# Altium PCB DC-Motor-Driver-v2.0.PcbDoc (part 1 of 5)
Units mil, origin at the board's own origin, x right, y up, seen from the top; angles counter-clockwise.
Board outline 3074 x 1810 mil, 4 copper layers (Top Layer, Signal 1, Signal 2, Bottom Layer), stack 62.055 mil thick; 232 components, 182 nets, 976 pads, 361 vias.
Unrouted connection lines stored in the file: 36.
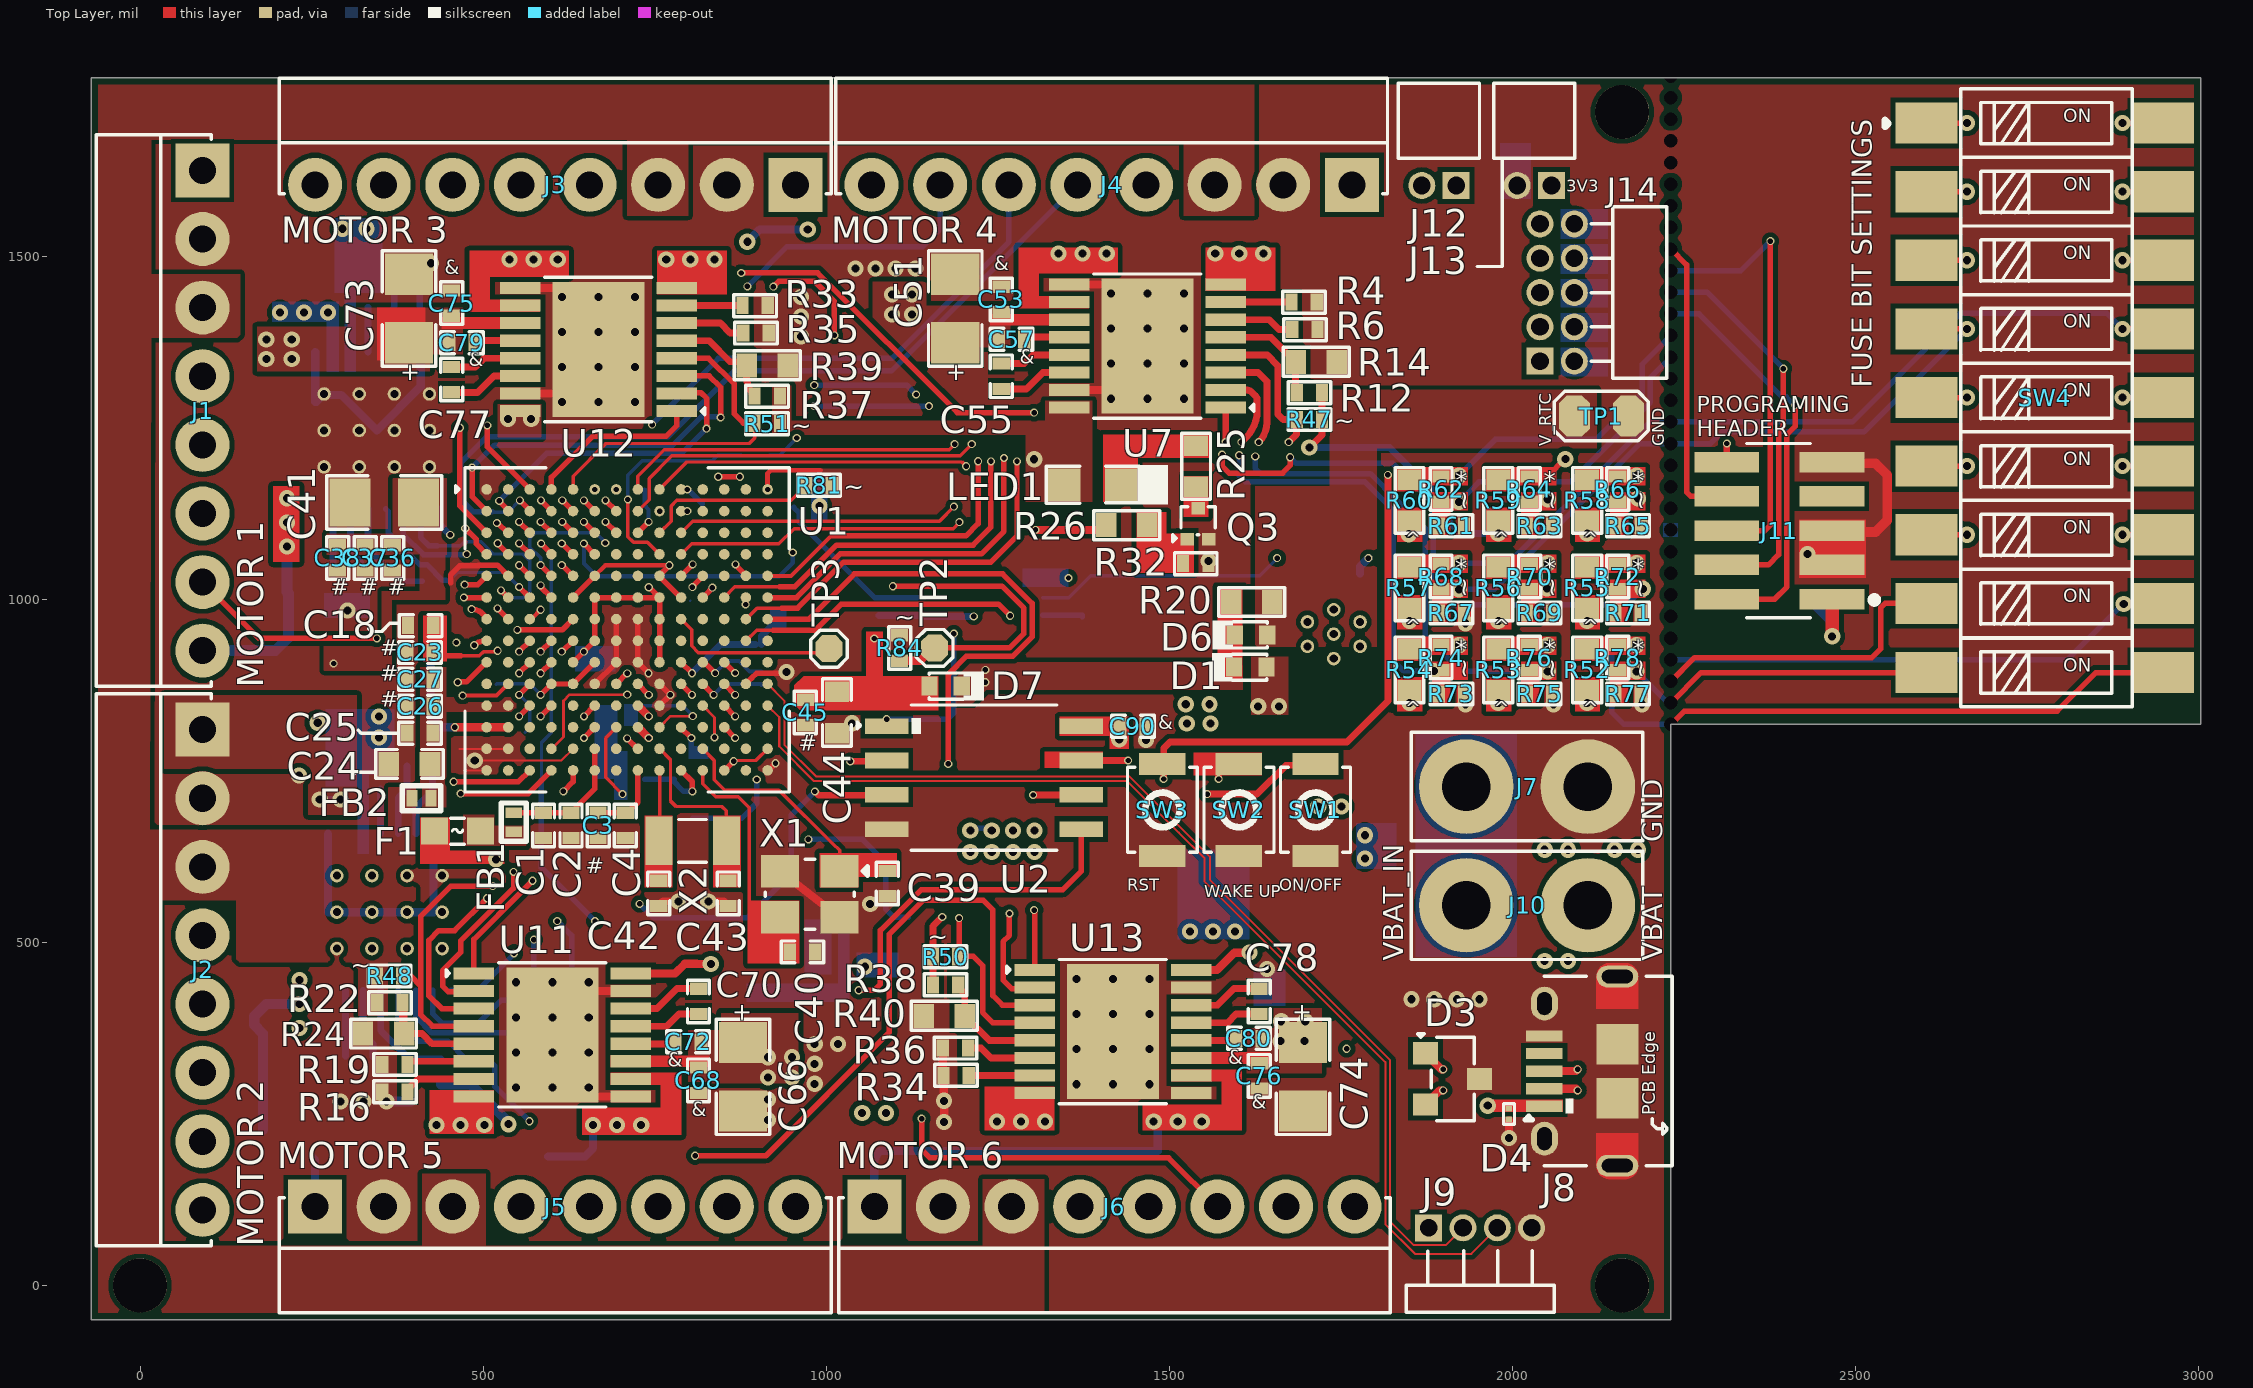
[diagram p0: Top Layer view]
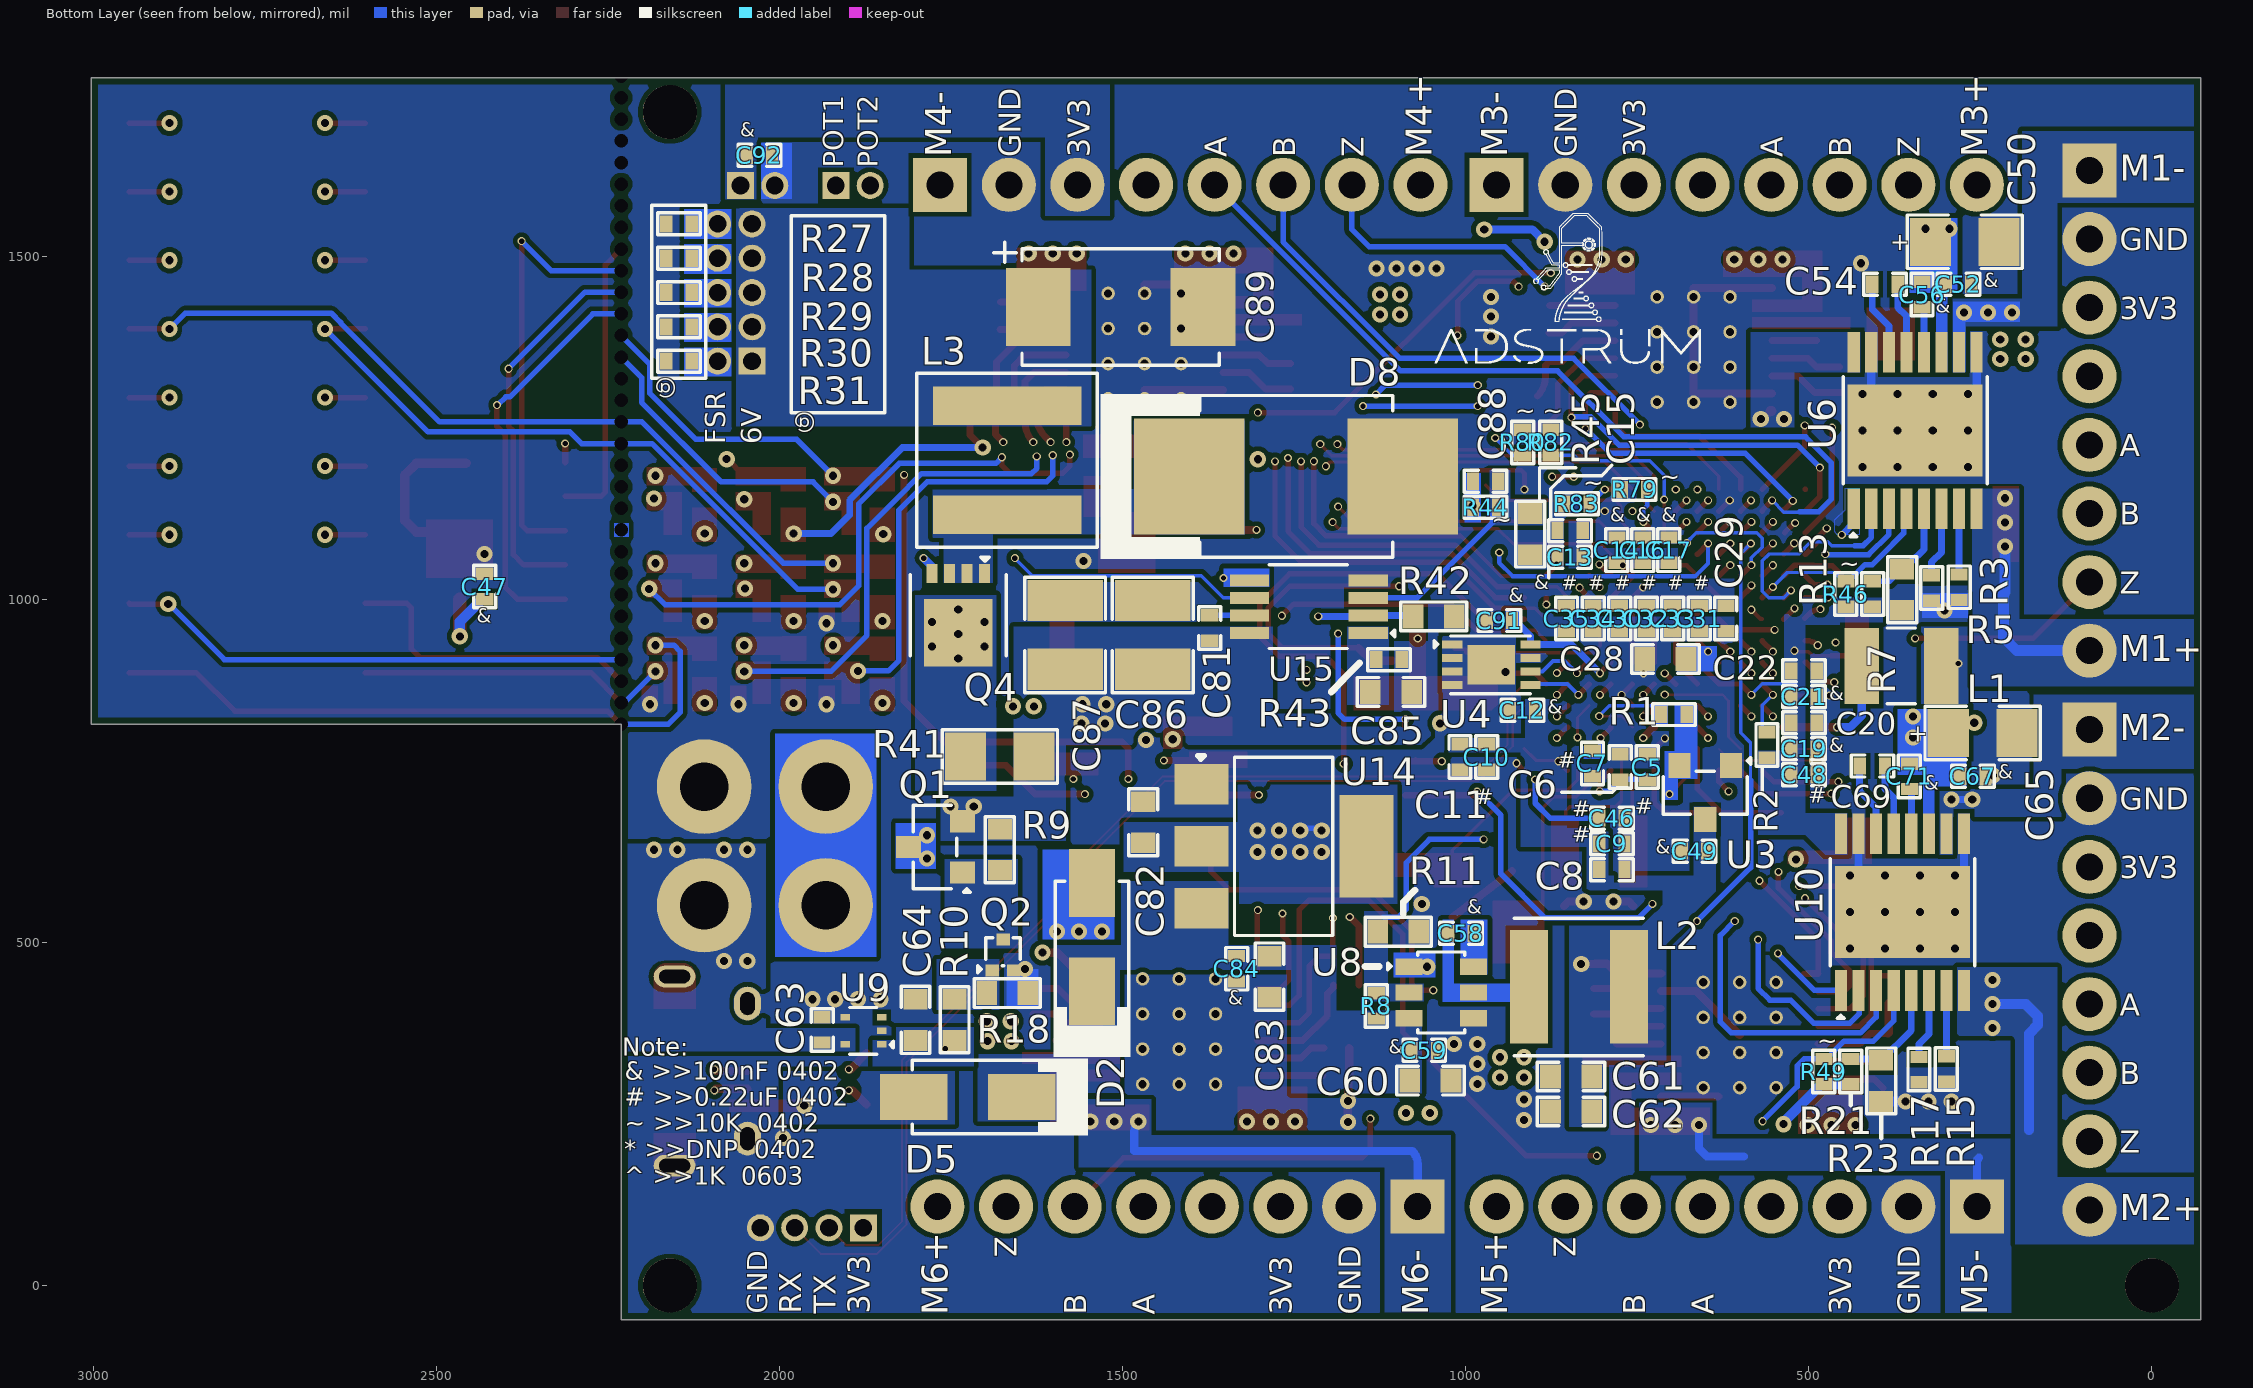
[diagram p1: Bottom Layer view, seen from below]
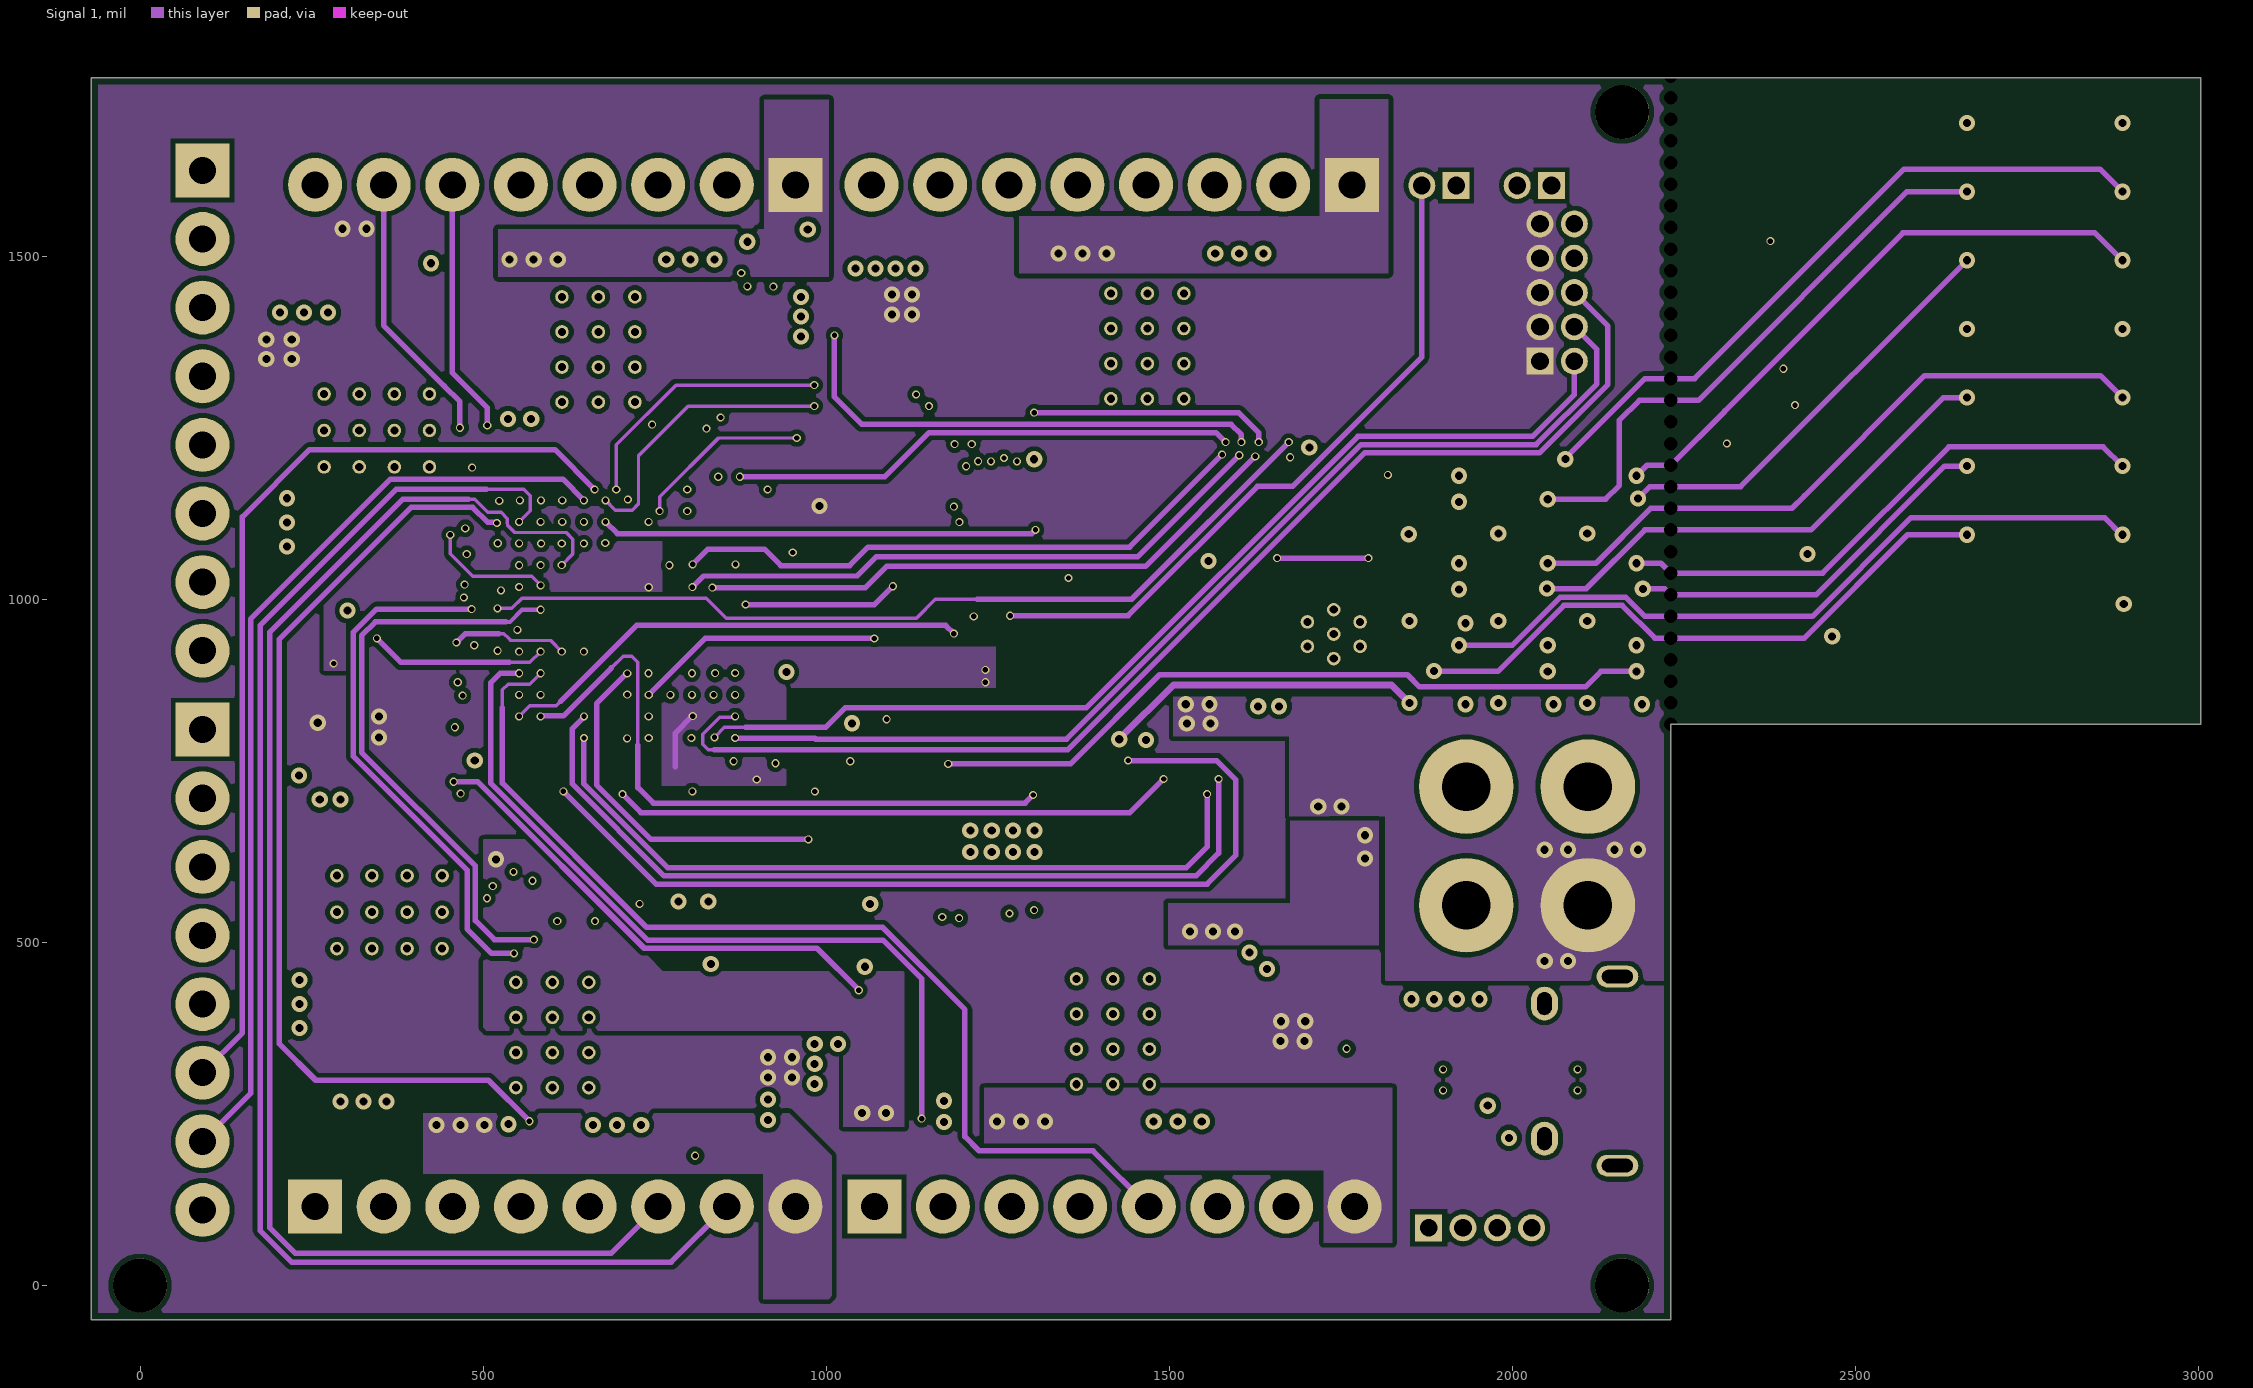
[diagram p2: Signal 1]
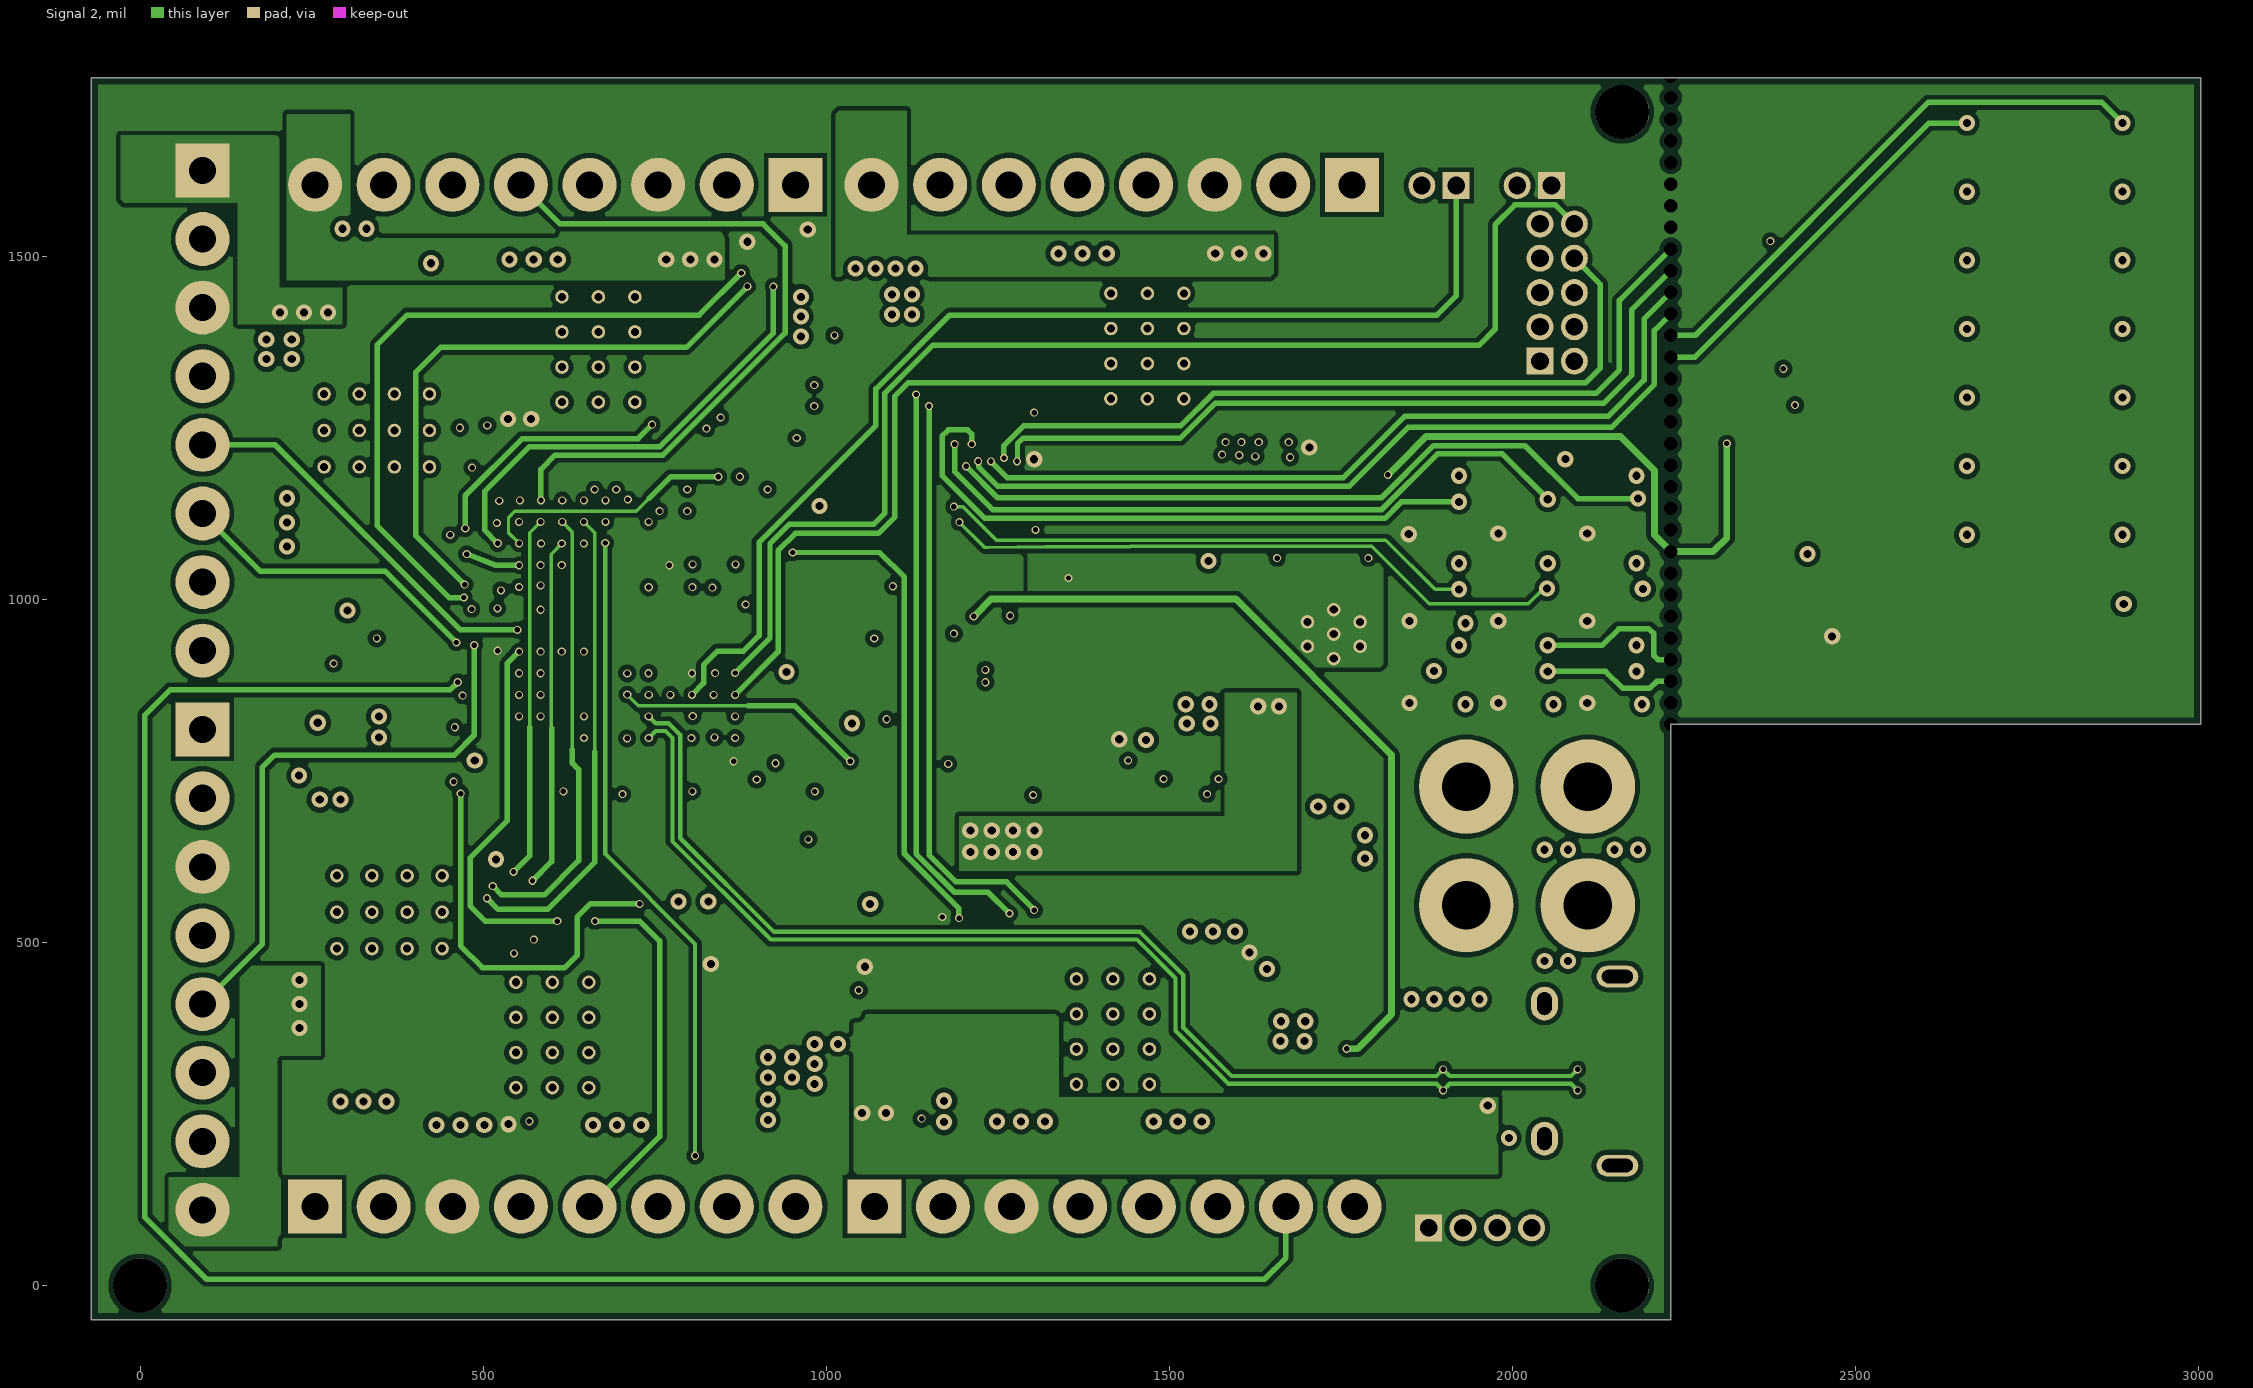
[diagram p3: Signal 2]

## Layer stack, top to bottom
Top Solder: solder mask 0.5, Solder Resist, Dk 3.5
Top Layer: signal copper 1.181
Dielectric 2: prepreg 8.284, PP-006, Dk 4.1
Signal 1: signal copper 0.598
Dielectric 1: core 41.929, FR-4, Dk 4.8
Signal 2: signal copper 0.598
Dielectric 3: prepreg 8.284, PP-006, Dk 4.1
Bottom Layer: signal copper 1.181
Bottom Solder: solder mask 0.5, Solder Resist, Dk 3.5

## Board outline
-71,-50 2231,-50 2231,817.54 3003,817.54 3003,1760 -71,1760

## Design rules (kind name [scope] priority, off if disabled: settings)
BoardOutlineClearance [All] p1: gap=0 ignorepadtopadclearanceinfootprint=FALSE except(10: Poly-OutlineEdge)
Clearance Clearance_1 [All] p1: gap=7 ignorepadtopadclearanceinfootprint=FALSE except(4: Arc-Arc Arc-Track Arc-SMDPad Arc-THPad Track-Track Track-SMDPad Track-THPad SMDPad-SMDPad SMDPad-THPad THPad-THPad)
Clearance Clearance_BGA [WithinRoom('BGA')] p2: gap=3 ignorepadtopadclearanceinfootprint=FALSE
DiffPairsRouting [All] p1: maxlimit=5 minlimit=4 mostfreqgap=5 toplayer_maxgap=4 toplayer_prefgap=4 toplayer_minwidth=12 toplayer_maxwidth=12 toplayer_prefwidth=12 midlayer1_mingap=5 midlayer1_minwidth=6.27 midlayer1_maxwidth=6.27 midlayer1_prefwidth=6.27 midlayer2_mingap=5 midlayer2_minwidth=6.27 midlayer2_maxwidth=6.27 midlayer2_prefwidth=6.27 bottomlayer_maxgap=4 bottomlayer_prefgap=4 bottomlayer_minwidth=12 bottomlayer_maxwidth=12 bottomlayer_prefwidth=12 impedanceprofiledriven=TRUE impedanceprofileid={C171A0CF-75CA-4105-AF21-8C6E3F260B6E} impedanceprofilevalue=90.000000 maxuncoupledlength=500
HoleToHoleClearance [All] p1: gap=0 allowstackedmicrovias=TRUE
MatchedLengths "Schematic Matched Net Lengths" [InNetClass('GSM_USB')] p1: tolerance=50 checknetsindiffpair=TRUE checkdiffpairvsdiffpair=FALSE checkxsignals=FALSE checkothers=FALSE
MaxMinImpedance "Schematic Impedance Constraint" [InNetClass('GSM_USB')] p1: minimum=85.00 maximum=90.00
MinimumSolderMaskSliver [All] p1: minsoldermaskwidth=0
PolygonConnect [All] p1: connectstyle=Direct reliefconductorwidth=10 reliefentries=4 polygonreliefangle="90 Angle" airgapwidth=10
RoutingVias RoutingVias_BGA [WithinRoom('BGA')] p1: holewidth=7.87 width=11.81 viastyle="Through Hole" minholewidth=7.87 minwidth=11.81 maxholewidth=7.87 maxwidth=11.81
RoutingVias [All] p2: holewidth=11.81 width=23.62 viastyle="Through Hole" minholewidth=7.87 minwidth=11.81 maxholewidth=11.81 maxwidth=23.62
SilkToSilkClearance [All] p1: silktosilkclearance=0
SilkToSolderMaskClearance [IsPad] p1: minsilkscreentomaskgap=0 clearancetoexposedcopper=TRUE
SolderMaskExpansion [All] p1: expansion=4 istentingtop=FALSE
UnRoutedNet [All] p1: checkbadconnections=TRUE
Width [All] p1: maxlimit=100 minlimit=3 preferedwidth=22
Width Width_BGA [WithinRoom('BGA')] p2: maxlimit=3 minlimit=3 preferedwidth=3
24 further rules are at their usual default settings.

## Classes and differential pairs
component class Power_Section: C58 C59 C60 C61 C62 C63 C64 C81 C82 C83 C84 C85 C86 C87 C88 C89 D2 D3 D4 D5 D8 J7 J8 J10 L2 L3 Q1 Q2 Q4 R8 R9 R10 R11 R18 R41 R42 R43 R44 R45 U8 U9 U14 U15
component class Motor_Section: C50 C51 C52 C53 C54 C55 C56 C57 C65 C66 C67 C68 C69 C70 C71 C72 C73 C74 C75 C76 C77 C78 C79 C80 C92 J1 J2 J3 J4 J5 J6 J9 J12 J13 J14 LED1 Q3 R3 R4 R5 R6 R7 R12 R13 R14 R15 R16 R17 R19 R21 R22 R23 R24 R25 R26 R27 R28 R29 R30 R31 R32 R33 R34 R35 R36 R37 R38 R39 R40 R46 R47 R48 R49 R50 R51 R84 TP2 TP3 U6 U7 U10 U11 U12 U13
component class Controller_Section: C1 C2 C3 C4 C5 C6 C7 C8 C9 C10 C11 C12 C13 C14 C15 C16 C17 C18 C19 C20 C21 C22 C23 C24 C25 C26 C27 C28 C29 C30 C31 C32 C33 C34 C35 C36 C37 C38 C39 C40 C41 C42 C43 C44 C45 C46 C47 C48 C49 C90 C91 D1 D6 D7 F1 FB1 FB2 J11 L1 R1 R2 R20 SW1 SW2 SW3 TP1 U1 U2 U3 U4 X1 X2
component class Controller_Fuses_Sheet: R52 R53 R54 R55 R56 R57 R58 R59 R60 R61 R62 R63 R64 R65 R66 R67 R68 R69 R70 R71 R72 R73 R74 R75 R76 R77 R78 R79 R80 R81 R82 R83 SW4
differential pair class GSM_USB_Lines: USB_D
net class GSM_USB: USB_D_N USB_D_P
differential pair USB_D: +USB_D_P -USB_D_N

## Components (designator, comment, footprint, x,y, rotation, side; value= is the part's Value field where it differs from the comment)
C1 "1uF" Cap-0402 588,670.5 r90 top locked
C2 "1uF" Cap-0402 628,670.5 r90 top locked
C3 "0.22uF" Cap-0402 667.5,670.5 r90 top locked
C4 "4.7uF" Cap-0402 707,670.5 r90 top locked
C5 "0.22uF" Cap-0402 735.5,755.5 r270 bottom locked
C6 "4.7uF" Cap-0402 775,755.5 r270 bottom locked
C7 "0.22uF" Cap-0402 815.29,760.8 r90 bottom locked
C8 "4.7uF" Cap-0402 787.08,606 r0 bottom locked
C9 "0.22uF" Cap-0402 787.08,643.5 r0 bottom locked
C10 "0.22uF" Cap-0402 969.46,770 r90 bottom locked
C11 "1uF" Cap-0402 1008.46,770 r90 bottom locked
C12 "100nF" Cap-0402 917.5,838 r180 bottom locked
C13 "100nF" Cap-0402 847.77,1061.5 r180 bottom locked
C14 "100nF" Cap-0402 779.77,1071.5 r270 bottom locked
C15 "4.7uF" Cap-0402 847.77,1100 r180 bottom locked
C16 "100nF" Cap-0402 741.89,1071.5 r270 bottom locked
C17 "100nF" Cap-0402 704,1071.5 r270 bottom locked
C18 "4.7uF" Cap-0402 409,961.57 r0 top locked
C19 "100nF" Cap-0402 507,781.89 r0 bottom locked
C20 "4.7uF" Cap-0402 507,819.78 r0 bottom locked
C21 "100nF" Cap-0402 507,857.67 r0 bottom locked
C22 "4.7uF" Cap-0402 507,895.56 r0 bottom locked
C23 "0.22uF" Cap-0402 408.08,922.43 r0 top locked
C24 "22uF" Cap-0603 392.54,760 r0 top locked
C25 "4.7uF" Cap-0402 408.08,805 r180 top locked
C26 "0.22uF" Cap-0402 408.08,844.14 r0 top locked
C27 "0.22uF" Cap-0402 408.08,883.29 r0 top locked
C28 "22uF" Cap-0603 709,913 r180 bottom
C29 "4.7uF" Cap-0402 620.94,971.84 r270 bottom locked
C30 "0.22uF" Cap-0402 775.72,971.84 r90 bottom locked
C31 "0.22uF" Cap-0402 659.63,971.84 r90 bottom locked
C32 "0.22uF" Cap-0402 737.02,971.84 r90 bottom locked
C33 "0.22uF" Cap-0402 698.33,971.84 r90 bottom locked
C34 "0.22uF" Cap-0402 814.41,971.84 r90 bottom locked
C35 "0.22uF" Cap-0402 853.11,971.84 r90 bottom locked
C36 "0.22uF" Cap-0402 368.06,1060.38 r90 top
C37 "0.22uF" Cap-0402 327.99,1060.38 r90 top
C38 "0.22uF" Cap-0402 287.92,1060.38 r90 top
C39 "12pF" Cap-0402 1089,585.5 r270 top locked
C40 "12pF" Cap-0402 965.5,486 r0 top locked
C41 "33uF" Cap-1206 355.92,1141 r0 top
C42 "12pF" Cap-0402 756,571.5 r270 top locked
C43 "12pF" Cap-0402 857,571.5 r270 top locked
C44 "10uF" Cap-0603 1015.54,835 r90 top locked
C45 "0.22uF" Cap-0402 969.54,835 r90 top locked
C46 "0.22uF" Cap-0402 787.08,681 r0 bottom locked
C47 "100nF" Cap-0402 2429.77,1018.5 r270 bottom
C48 "0.22uF" Cap-0402 507,744 r0 bottom locked
C49 "100nF" Cap-0402 666.5,633 r180 bottom locked
C50 "47uF" Tant-1206 272.76,1521 r180 bottom locked
C51 "47uF" Tant-1206 1188,1423.76 r90 top
C52 "100nF" Cap-0402 282,1459 r0 bottom locked
C53 "100nF" Cap-0402 1255,1437 r270 top locked
C54 "22nF" Cap-0402 389,1459 r0 bottom locked
C55 "22nF" Cap-0402 1255,1325 r270 top locked
C56 "100nF" cap-0402 335,1444 r270 bottom locked
C57 "100nF" cap-0402 1270,1379 r0 top locked
C58 "100nF" Cap-0402 1007,513 r180 bottom locked
C59 "100nF" Cap-0402 1060.5,342.5 r0 bottom locked
C60 "10uF" Cap-0603 1051.5,298.5 r0 bottom locked
C61 "22uF" Cap-0603 846.5,304.5 r180 bottom locked
C62 "22uF" Cap-0603 846.5,253.5 r180 bottom locked
C63 "1uF" Cap-0402 1938,372.5 r270 bottom locked
C64 "1nF" CAP-0603 1802,387 r270 bottom locked
C65 "47uF" Tant-1206 246.74,805 r180 bottom
C66 "47uF" Tant-1206 878.9,304 r270 top locked
C67 "100nF" cap-0402 261,742 r0 bottom
C68 "100nF" Cap-0402 813.8,299 r90 top locked
C69 "22nF" Cap-0402 407.5,757 r0 bottom locked
C70 "22nF" Cap-0402 813.8,414 r90 top locked
C71 "100nF" cap-0402 353.5,742 r270 bottom locked
C72 "100nF" cap-0402 798.8,355 r180 top locked
C73 "47uF" Tant-1206 392,1423.76 r90 top locked
C74 "47uF" Tant-1206 1695,304 r270 top locked
C75 "100nF" cap-0402 454,1431.5 r270 top locked
C76 "100nF" cap-0402 1631,305.5 r90 top locked
C77 "22nF" Cap-0402 454,1320 r270 top locked
C78 "22nF" Cap-0402 1630.8,414 r90 top locked
C79 "100nF" cap-0402 469,1374 r0 top locked
C80 "100nF" cap-0402 1615.8,360 r180 top locked
C81 "470nF" Cap-0402 1373,958 r270 bottom locked
C82 "22uF" Cap-0603 1470,675 r270 bottom locked
C83 "10uF" Cap-0603 1286,450 r90 bottom locked
C84 "100nF" Cap-0402 1334,461.5 r90 bottom locked
C85 "1nF" Cap-0603 1109,865 r180 bottom locked
C86 "47uF" Cap-1210 1456,948 r270 bottom locked
C87 "47uF" Cap-1210 1584,948 r270 bottom locked
C88 "3nF" Cap-0402 971,1172 r0 bottom locked
C89 "47uF" Case-D 1503.01,1426 r180 bottom locked
C90 "100nF" Cap-0402 1447,815 r180 top
C91 "100nF" Cap-0402 951.03,968.98 r180 bottom locked
C92 "100nF" Cap-0402 2029.5,1647 r0 bottom locked
D1 "RB521S30YL" SOD-523 1618,901 r180 top
D2 "SS36" SMA 1544.72,507.74 r90 bottom locked
D3 "ESD5302F-3/TR" Sot-23 1912.63,301 r270 top locked
D4 "PESD5V0H1BSFYL" DSN0603-2 1995,249.87 r90 top locked
D5 "SS36" SMA 1725.74,274.5 r0 bottom locked
D6 "RB521S30YL" SOD-523 1619,948 r180 top
D7 "RB521S30YL" SOD-523 1174,873.5 r0 top
D8 "B540C-13-F" SMC 1247.49,1179 r180 bottom locked value=300pF
F1 "SMD0603-050" Fuse-0603 462.54,662 r0 top locked
FB1 "BLM15PD121SN1D" IND-0402 544.5,675.06 r90 top locked
FB2 "BLM15PD121SN1D" IND-0402 410.22,710 r0 top locked
J1 "PZ254R-11-08P" "HDR 1x8 Male Right Angle" 91,1275 r270 top locked
J2 "PZ254R-11-08P" "HDR 1x8 Male Right Angle" 91,460 r270 top locked
J3 "PZ254R-11-08P" "HDR 1x8 Male Right Angle" 605,1604 r180 top locked
J4 "PZ254R-11-08P" "HDR 1x8 Male Right Angle" 1416,1604 r180 top locked
J5 "PZ254R-11-08P" "HDR 1x8 Male Right Angle" 605,115 r0 top locked
J6 "PZ254R-11-08P" "HDR 1x8 Male Right Angle" 1420,115 r0 top locked
J7 "Through Hole Pads 2" "Through Hole Pads 2" 1932.83,727 r0 top locked
J8 "10118194-0001LF" 10118194-0001LF_ 2046.7,312.37 r90 top locked
J9 "KH-1.27PH90-1X4P-L10.5" "HDR1X4 (R/A Male) 1.27mm Pitch" 1953,84 r0 top locked
J10 "Through Hole Pads 2" "Through Hole Pads 2" 1932.83,554 r0 top locked
J11 "20021121-00010C4LF" 20021121-00010C4LF_ 2389.23,1100 r90 top locked
J12 "1.27-2P" "HDR1X2 (R/A Male) 1.27mm Pitch" 1893,1603 r180 top locked
J13 "1.27-2P" "HDR1X2 (R/A Male) 1.27mm Pitch" 2032,1603 r180 top locked
J14 "1271WR-2x5P" "HDR 2x5TH (rigth angle) 1.27mm Pitch" 2065.2,1447 r90 top locked
L1 "4.7uH" IND-1210 365,903 r0 bottom
L2 "3.9uH" SWPA5020S3R9NT 835,435 r180 bottom locked
L3 "1uH" XAL6030-102MEC 1668,1202.53 r90 bottom locked
LED1 "Orange" LED-0805 1388.32,1167 r0 top locked
Q1 "AO3407" SOT-23 1773,639 r90 bottom locked
Q2 "MMBT3904M" SOT-723 1674.25,481.64 r180 bottom locked
Q3 "MMBT3904M" SOT-723 1542,1110 r0 top
Q4 "CSD25402Q3A" "8-VSONP (3x3.3)" 1739.61,975.62 r270 bottom locked
R1 "100K" Res-0402 696.5,832 r180 bottom locked
R2 "30K" Res-0402 561,787.5 r90 bottom locked
R3 "0R" Res-0402 281.02,1017.5 r270 bottom locked
R4 "0R" Res-0402 1696.5,1433 r0 top locked
R5 "4.3k" Res-0402 321,1016.5 r270 bottom locked value=4.3kR
R6 "4.3k" Res-0402 1697.5,1393 r0 top locked value=4.3kR
R7 "1K" Res-0402 407,1007.5 r270 bottom
R8 "DNP" Res-0402 1130.5,407.5 r270 bottom locked
R9 "1K" Res-0603 1679,635 r270 bottom locked
R10 "4.7K" Res-0603 1745,387 r90 bottom locked
R11 "1M" Res-0603 1098.5,515.5 r0 bottom locked
R12 "1K" Res-0402 1704,1301 r0 top
R13 "3.16K" Res-0603 364,1014 r90 bottom
R14 "3.16K" Res-0603 1714,1346 r180 top locked
R15 "0R" Res-0402 299.52,315.5 r270 bottom locked
R16 "0R" Res-0402 371.3,282.02 r180 top
R17 "4.3k" Res-0402 339.5,314.5 r270 bottom locked value=4.3kR
R18 "1M" Res-0603 1668,426 r0 bottom
R19 "4.3k" Res-0402 371.3,322 r180 top value=4.3kR
R20 "1K" Res-0603 1620,996 r180 top
R21 "1K" Res-0402 439,311.5 r270 bottom locked
R22 "1K" Res-0402 364,412 r180 top
R23 "3.16K" Res-0603 394.5,298 r90 bottom locked
R24 "3.16K" Res-0603 354.8,367 r0 top
R25 "130R" Res-0603 1539,1193.83 r90 top
R26 "4.7K" Res-0603 1438,1108 r0 top locked
R27 "2.87k" Res-0402 2146.5,1547 r180 bottom locked
R28 "2.87k" Res-0402 2146.5,1497 r180 bottom locked
R29 "2.87k" Res-0402 2146.5,1447 r180 bottom locked
R30 "2.87k" Res-0402 2146.5,1397 r180 bottom locked
R31 "2.87k" Res-0402 2146.5,1347 r180 bottom locked
R32 "47K" Res-0402 1538.5,1052 r0 top
R33 "0R" Res-0402 896.5,1427.98 r0 top locked
R34 "0R" Res-0402 1189.3,306.02 r180 top locked
R35 "4.3k" Res-0402 897.5,1388 r0 top locked value=4.3kR
R36 "4.3k" Res-0402 1188.3,346 r180 top locked value=4.3kR
R37 "1K" Res-0402 914,1296 r0 top
R38 "1K" Res-0402 1174,438 r180 top
R39 "3.16K" Res-0603 914,1341 r180 top locked
R40 "3.16K" Res-0603 1171.8,393 r0 top locked
R41 "10mR" Res-1206 1679,771 r180 bottom locked
R42 "68.1K" Res-0603 1046.54,975 r180 bottom locked
R43 "4.12K" Res-0402 1112,912 r180 bottom locked value=4.12kR
R44 "10K" Res-0402 971,1134 r180 bottom locked
R45 "2.61k" Res-0603 906,1095 r90 bottom locked value=2.61kR
R46 "10K" Res-0402 446,1007.5 r90 bottom
R47 "10K" Res-0402 1704,1262 r180 top locked
R48 "10K" Res-0402 363.5,451 r0 top
R49 "10K" Res-0402 478,311.5 r90 bottom locked
R50 "10K" Res-0402 1174,479 r0 top locked
R51 "10K" Res-0402 914,1256 r180 top locked
R52 "1K" Res-0603 2109,897 r270 top
R53 "1K" Res-0603 1979.5,897 r270 top
R54 "1K" Res-0603 1850,897 r270 top
R55 "1K" Res-0603 2109,1016.5 r270 top
R56 "1K" Res-0603 1979.5,1016.5 r270 top
R57 "1K" Res-0603 1850,1016.5 r270 top
R58 "1K" Res-0603 2109,1144 r270 top
R59 "1K" Res-0603 1979.5,1144 r270 top
R60 "1K" Res-0603 1850,1144 r270 top
R61 "10K" Res-0402 1911,1107 r180 top
R62 "DNP" Res-0402 1896,1160.5 r90 top
R63 "10K" Res-0402 2039.5,1107 r180 top
R64 "DNP" Res-0402 2024.5,1160.5 r90 top
R65 "10K" Res-0402 2168.5,1107 r180 top
R66 "DNP" Res-0402 2153.5,1160.5 r90 top
R67 "10K" Res-0402 1911,980 r180 top
R68 "DNP" Res-0402 1896,1033 r90 top
R69 "10K" Res-0402 2039.5,980 r180 top
R70 "DNP" Res-0402 2025,1033 r90 top
R71 "10K" Res-0402 2168.5,980 r180 top
R72 "DNP" Res-0402 2153.5,1033 r90 top
R73 "10K" Res-0402 1911,862 r180 top
R74 "DNP" Res-0402 1896,915 r90 top
R75 "10K" Res-0402 2039.5,862 r180 top
R76 "DNP" Res-0402 2024.5,915 r90 top
R77 "10K" Res-0402 2168.5,862 r180 top
R78 "DNP" Res-0402 2153.5,915 r90 top
R79 "10K" Res-0402 754,1160 r180 bottom
R80 "10K" Res-0402 917,1228.5 r270 bottom
R81 "10K" Res-0402 989.5,1166 r180 top
R82 "10K" Res-0402 876,1228.5 r270 bottom
R83 "10K" Res-0402 838,1139 r180 bottom
R84 "10K" Res-0402 1107,929 r90 top
SW1 "B3U-1000P" B3U-1000P 1713,693 r270 top locked
SW2 "B3U-1000P" B3U-1000P 1601.5,693 r270 top locked
SW3 "B3U-1000P" B3U-1000P 1490,693 r270 top locked
SW4 "DSIC09LSGET" DSIC09LSGET 2775.75,1293.6 r270 top locked
TP1 "2 Test Pad" "2 Test Pad" 2090.26,1267 r0 top
TP2 "TEST POINT 0.5mm Dia" "Test-point - 0.5mm" 1158,929 r90 top
TP3 "TEST POINT 0.5mm Dia" "Test-point - 0.5mm" 1004,928 r90 top
U1 "MIMXRT1062DVJ6B" "196-LFBGA (12x12)" 709.73,955.31 r0 top locked
U2 "W25Q64JVSSIM" "SOIC-8 (208 mil)" 1229.93,740 r0 top locked
U3 "UM803RS" SOT-23 650.91,718.43 r0 bottom locked
U4 "M24C64-FMC6TG" DFN-8-EP(2x3) 962.77,904.5 r180 bottom locked
U6 "DRV8874PWPR" HTSSOP-16 345,1246 r90 bottom locked
U7 "DRV8874PWPR" HTSSOP-16 1468,1369 r180 top locked
U8 "AP63203WU-7" TSOT-23-6 1035.74,426.9 r180 bottom locked
U9 "BD4860FVE-TR" "VSOF 5" 1878,371 r0 bottom locked
U10 "DRV8874PWPR" HTSSOP-16 363.5,544 r90 bottom locked
U11 "DRV8874PWPR" HTSSOP-16 600.8,365 r0 top locked
U12 "DRV8874PWPR" HTSSOP-16 668,1364 r180 top locked
U13 "DRV8874PWPR" HTSSOP-16 1417.8,370 r0 top locked
U14 "AZ1117CH-3.3TRG1" "SOT- 223" 1265,640 r270 bottom locked
U15 "LM25085MM/NOPB" "8-VSSOP (5x3.1mm)" 1228.61,989.2 r0 bottom locked
X1 "24MHZ" X322524MOB4SI- 976.08,570 r180 top locked
X2 "32.7680KHZ" NX3215SA-32.768K-STD-MUA-8_ 805.21,648 r180 top locked

## Footprints (in the part's own frame and the unit in brackets; to place one, negate y for a bottom-side part, rotate by r counter-clockwise, add the part's x,y. Pads: shape width x height; smd on the part's side, far side on the other; paste and mask are expansions set on the pad)
"2 Test Pad" [mil]
  oct 45x60 smd: 1(0,0) 2(78.74,0)
  silkscreen extent -29,-36 108,36
"8-VSONP (3x3.3)" [mm]
  rect 0.7x0.4 smd mask+0.05: 1(-1.576,0.975) 2(-1.576,0.325) 3(-1.576,-0.325) 4(-1.576,-0.975)
  round 0.5 hole 0.3 mask+0: 5(0.219,-0.975) 5(0.219,0.975) 5(1.124,-0.975) 5(1.124,0.975) 6(-0.234,0) 7(0.671,0) 8(1.576,0)
  rect 2.51x2.55 smd mask+0.05: 5(0.619,0)
  silkscreen extent -2.18,-1.78 1.48,1.78, body extent -1.63,-1.73 1.67,1.73, height 0.9
"8-VSSOP (5x3.1mm)" [mm]
  rect 1.45x0.45 smd mask+0.05: 1(-2.2,0.975) 2(-2.2,0.325) 3(-2.2,-0.325) 4(-2.2,-0.975) 5(2.2,-0.975) 6(2.2,-0.325) 7(2.2,0.325) 8(2.2,0.975)
  silkscreen extent -3.17,-1.55 1.47,1.55, body extent -2.45,-1.5 2.45,1.5, height 1.1
"196-LFBGA (12x12)" [mm]
  round 0.39 smd: A1(-5.2,5.2) A2(-4.4,5.2) A3(-3.6,5.2) A4(-2.8,5.2) A5(-2,5.2) A6(-1.2,5.2) A7(-0.4,5.2) A8(0.4,5.2) A9(1.2,5.2) A10(2,5.2) A11(2.8,5.2) A12(3.6,5.2) A13(4.4,5.2) A14(5.2,5.2) B1(-5.2,4.4) B2(-4.4,4.4) B3(-3.6,4.4) B4(-2.8,4.4) B5(-2,4.4) B6(-1.2,4.4) B7(-0.4,4.4) B8(0.4,4.4) B9(1.2,4.4) B10(2,4.4) B11(2.8,4.4) B12(3.6,4.4) B13(4.4,4.4) B14(5.2,4.4) C1(-5.2,3.6) C2(-4.4,3.6) C3(-3.6,3.6) C4(-2.8,3.6) C5(-2,3.6) C6(-1.2,3.6) C7(-0.4,3.6) C8(0.4,3.6) C9(1.2,3.6) C10(2,3.6) C11(2.8,3.6) C12(3.6,3.6) C13(4.4,3.6) C14(5.2,3.6) D1(-5.2,2.8) D2(-4.4,2.8) D3(-3.6,2.8) D4(-2.8,2.8) D5(-2,2.8) D6(-1.2,2.8) D7(-0.4,2.8) D8(0.4,2.8) D9(1.2,2.8) D10(2,2.8) D11(2.8,2.8) D12(3.6,2.8) D13(4.4,2.8) D14(5.2,2.8) E1(-5.2,2) E2(-4.4,2) E3(-3.6,2) E4(-2.8,2) E5(-2,2) E6(-1.2,2) E7(-0.4,2) E8(0.4,2) E9(1.2,2) E10(2,2) E11(2.8,2) E12(3.6,2) E13(4.4,2) E14(5.2,2) F1(-5.2,1.2) F2(-4.4,1.2) F3(-3.6,1.2) F4(-2.8,1.2) F5(-2,1.2) F6(-1.2,1.2) F7(-0.4,1.2) F8(0.4,1.2) F9(1.2,1.2) F10(2,1.2) F11(2.8,1.2) F12(3.6,1.2) F13(4.4,1.2) F14(5.2,1.2) G1(-5.2,0.4) G2(-4.4,0.4) G3(-3.6,0.4) G4(-2.8,0.4) G5(-2,0.4) G6(-1.2,0.4) G7(-0.4,0.4) G8(0.4,0.4) G9(1.2,0.4) G10(2,0.4) G11(2.8,0.4) G12(3.6,0.4) G13(4.4,0.4) G14(5.2,0.4) H1(-5.2,-0.4) H2(-4.4,-0.4) H3(-3.6,-0.4) H4(-2.8,-0.4) H5(-2,-0.4) H6(-1.2,-0.4) H7(-0.4,-0.4) H8(0.4,-0.4) H9(1.2,-0.4) H10(2,-0.4) H11(2.8,-0.4) H12(3.6,-0.4) H13(4.4,-0.4) H14(5.2,-0.4) J1(-5.2,-1.2) J2(-4.4,-1.2) J3(-3.6,-1.2) J4(-2.8,-1.2) J5(-2,-1.2) J6(-1.2,-1.2) J7(-0.4,-1.2) J8(0.4,-1.2) J9(1.2,-1.2) J10(2,-1.2) J11(2.8,-1.2) J12(3.6,-1.2) J13(4.4,-1.2) J14(5.2,-1.2) K1(-5.2,-2) K2(-4.4,-2) K3(-3.6,-2) K4(-2.8,-2) K5(-2,-2) K6(-1.2,-2) K7(-0.4,-2) K8(0.4,-2) K9(1.2,-2) K10(2,-2) K11(2.8,-2) K12(3.6,-2) K13(4.4,-2) K14(5.2,-2) L1(-5.2,-2.8) L2(-4.4,-2.8) L3(-3.6,-2.8) L4(-2.8,-2.8) L5(-2,-2.8) L6(-1.2,-2.8) L7(-0.4,-2.8) L8(0.4,-2.8) L9(1.2,-2.8) L10(2,-2.8) L11(2.8,-2.8) L12(3.6,-2.8) L13(4.4,-2.8) L14(5.2,-2.8) M1(-5.2,-3.6) M2(-4.4,-3.6) M3(-3.6,-3.6) M4(-2.8,-3.6) M5(-2,-3.6) M6(-1.2,-3.6) M7(-0.4,-3.6) M8(0.4,-3.6) M9(1.2,-3.6) M10(2,-3.6) M11(2.8,-3.6) M12(3.6,-3.6) M13(4.4,-3.6) M14(5.2,-3.6) N1(-5.2,-4.4) N2(-4.4,-4.4) N3(-3.6,-4.4) N4(-2.8,-4.4) N5(-2,-4.4) N6(-1.2,-4.4) N7(-0.4,-4.4) N8(0.4,-4.4) N9(1.2,-4.4) N10(2,-4.4) N11(2.8,-4.4) N12(3.6,-4.4) N13(4.4,-4.4) N14(5.2,-4.4) P1(-5.2,-5.2) P2(-4.4,-5.2) P3(-3.6,-5.2) P4(-2.8,-5.2) P5(-2,-5.2) P6(-1.2,-5.2) P7(-0.4,-5.2) P8(0.4,-5.2) P9(1.2,-5.2) P10(2,-5.2) P11(2.8,-5.2) P12(3.6,-5.2) P13(4.4,-5.2) P14(5.2,-5.2)
  silkscreen extent -6.35,-6 6,6, body extent -6,-6 6,6, height 1.58
10118194-0001LF_ [mm]
  rect 0.42x1.35 smd: 1(-1.3,0) 2(-0.65,0) 3(0,0) 4(0.65,0) 5(1.3,0)
  rect 1.5x1.55 smd: MP1(-1,-2.7) MP2(1,-2.7)
  oval 1.25x1 hole 0.55 slot 0.85 at 0 deg: S1(-2.5,0) S2(2.5,0)
  oval 0.8x1.55 hole 0.5 slot 1.15 at 90 deg: S3(3.5,-2.7) S4(-3.5,-2.7)
  Top Layer region: 193 vertices and 0 holes, not listed, extent 2.3,-3.48 4,-1.925
  Top Layer region: 193 vertices and 0 holes, not listed, extent -4,-3.475 -2.3,-1.92
  silkscreen extent -3.51,-4.72 3.51,0.71, body extent -4.02,-5.34 4.03,0.19, height 2.69
20021121-00010C4LF_ [mm]
  rect 0.76x2.4 smd: 1(-2.54,-1.95) 2(-2.54,1.95) 3(-1.27,-1.95) 4(-1.27,1.95) 5(0,-1.95) 6(0,1.95) 7(1.27,-1.95) 8(1.27,1.95) 9(2.54,-1.95) 10(2.54,1.95)
  silkscreen extent -3.23,-3.64 3.23,1.22, body extent -3.17,-2.78 3.18,2.72, height 4.5
B3U-1000P [mm] "SWITCH TACTILE SPST-NO 0.05A 12V"
  rect 0.82x1.72 smd: 1(-1.7,0) 2(1.7,0)
  silkscreen extent -1.57,-1.3 1.57,1.3, body extent -2,-1.26 2,1.24, height 1.6
Cap-0402 [mil]
  rect 18x25 smd mask+2.36: 1(-18.5,0) 2(18.5,0)
  silkscreen extent -31,-16 31,16, body extent -20,-10 20,10, height 19
cap-0402 [mil]
  rect 18x25 smd mask+2.36: 1(-18.5,0) 2(18.5,0)
  silkscreen extent -31,-16 31,16, body extent -20,-10 20,10, height 19
Cap-0603 [mil]
  rect 30x35 smd mask+2.36: 1(-30,0) 2(30,0)
  silkscreen extent -49,-21 49,21, body extent -32,-16 31,16, height 34
CAP-0603 [mil]
  rect 30x35 smd mask+2.36: 1(-30,0) 2(30,0)
  silkscreen extent -49,-21 49,21, body extent -32,-16 31,16, height 34
Cap-1206 [mil] "SMD 1206"
  rect 60x70 smd: 1(-50,0) 2(50,0)
  silkscreen extent -84,-39 84,39, body extent -63,-31 63,32, height 39
Cap-1210 [mil] "SMD 1210"
  rect 60x110 smd: 1(-50,0) 2(50,0)
  silkscreen extent -84,-59 84,59, body extent -63,-49 63,49, height 39
Case-D [mm]
  rect 2.4x2.9 smd: 1(-3.05,0) 2(3.05,0)
  silkscreen extent -4.7,-2.15 3.65,2.39, body extent -3.65,-2.16 3.65,2.14, height 4
DFN-8-EP(2x3) [mm]
  rect 0.75x0.3 smd: 1(-1.45,0.75) 2(-1.45,0.25) 3(-1.45,-0.25) 4(-1.45,-0.75) 5(1.45,-0.75) 6(1.45,-0.25) 7(1.45,0.25) 8(1.45,0.75)
  rect 1.75x1.45 smd: 9(0,0)
  silkscreen extent -2.11,-1.07 1.45,1.07, body extent -1.5,-1 1.5,1, height 1
DSIC09LSGET [mil]
  rect 60x90 smd: 1(-400.4,-172.25) 2(-300.4,-172.25) 3(-200.4,-172.25) 4(-100.4,-172.25) 5(-0.4,-172.25) 6(99.6,-172.25) 7(199.6,-172.25) 8(299.6,-172.25) 9(400.4,-172.25) 10(400.4,172.25) 11(299.6,172.25) 12(199.6,172.25) 13(99.6,172.25) 14(-0.4,172.25) 15(-100.4,172.25) 16(-200.4,172.25) 17(-300.4,172.25) 18(-400.4,172.25)
  silkscreen extent -450,-233 450,128, body extent -450,-182 450,184, height 163
DSN0603-2 [mm]
  rect 0.2x0.24 smd mask+0.055: 1(-0.2,0) 2(0.2,0)
  silkscreen extent -0.38,-0.2 0.38,0.2, body extent -0.3,-0.15 0.3,0.15, height 0.32
Fuse-0603 [mm]
  rect 1x1 smd: 1(-0.85,0) 2(0.85,0)
  silkscreen extent -0.25,-0.48 0.25,0.48, body extent -0.77,-0.42 0.78,0.43, height 0.45
"HDR1X2 (R/A Male) 1.27mm Pitch" [mm]
  rect 1x1 hole 0.65 paste+0 mask+0.05: 1(-0.635,0)
  round 1 hole 0.65 paste+0 mask+0.05: 2(0.635,0)
  silkscreen extent -1.5,-3.78 1.5,-1.02, body extent -1.28,-7.3 1.27,0.22, height 2.4
"HDR1X4 (R/A Male) 1.27mm Pitch" [mm] "Connector; Header; 4 Position"
  rect 1x1 hole 0.65 paste+0 mask+0.05: 1(-1.905,0)
  round 1 hole 0.65 paste+0 mask+0.05: 2(-0.635,0) 3(0.635,0) 4(1.905,0)
  silkscreen extent -2.74,-3.13 2.74,-0.86, body extent -2.55,-7.18 2.54,0.23, height 2
"HDR 1x8 Male Right Angle" [mm]
  rect 2x2 hole 1: 1(-8.89,0)
  round 2 hole 1: 2(-6.35,0) 3(-3.81,0) 4(-1.27,0) 5(1.27,0) 6(3.81,0) 7(6.35,0) 8(8.89,0)
  silkscreen extent -10.21,-3.94 10.21,0.33, body extent -10.16,-10.05 10.17,0.35, height 2.5
"HDR 2x5TH (rigth angle) 1.27mm Pitch" [mm]
  rect 1x1 hole 0.65 paste+0 mask+0.05: 1(-2.54,0.635)
  round 1 hole 0.65 paste+0 mask+0.05: 2(-2.54,-0.635) 3(-1.27,0.635) 4(-1.27,-0.635) 5(0,0.635) 6(0,-0.635) 7(1.27,0.635) 8(1.27,-0.635) 9(2.54,0.635) 10(2.54,-0.635)
  silkscreen extent -3.17,-4.07 3.18,-1.27
HTSSOP-16 [mm]
  rect 1.5x0.45 smd: 1(-2.9,2.275) 2(-2.9,1.625) 3(-2.9,0.975) 4(-2.9,0.325) 5(-2.9,-0.325) 6(-2.9,-0.975) 7(-2.9,-1.625) 8(-2.9,-2.275) 9(2.9,-2.275) 10(2.9,-1.625) 11(2.9,-0.975) 12(2.9,-0.325) 13(2.9,0.325) 14(2.9,0.975) 15(2.9,1.625) 16(2.9,2.275)
  round 0.5 hole 0.3: 17(-1.35,-1.95) 17(-1.35,-0.65) 17(-1.35,0.65) 17(-1.35,1.95) 17(0,-1.95) 17(0,-0.65) 17(0,0.65) 17(0,1.95) 17(1.35,-1.95) 17(1.35,-0.65) 17(1.35,0.65) 17(1.35,1.95)
  rect 3.4x5 smd: 17(0,0)
  silkscreen extent -3.94,-2.67 1.98,2.67, body extent -3.2,-2.5 3.2,2.5, height 1.2
IND-0402 [mm]
  rect 0.4x0.6 smd: 1(-0.35,0) 2(0.35,0)
  silkscreen extent -0.71,-0.46 0.71,0.46, body extent -0.5,-0.25 0.5,0.25, height 0.25
IND-1210 [mm]
  rect 1.27x2.81 smd: 1(-1.471,0) 2(1.471,0)
  silkscreen extent -0.52,-1.4 0.52,1.4, body extent -1.6,-1.4 1.6,1.4, height 2.5
LED-0805 [mm]
  rect 1.2x1.2 smd: 1(-1.05,0) 2(1.05,0)
  silkscreen extent -1.73,-0.74 2.79,0.74, body extent -1,-0.62 1,0.63, height 1.1
NX3215SA-32.768K-STD-MUA-8_ [mm]
  rect 1x1.8 smd: 1(-1.25,0) 2(1.25,0)
  silkscreen extent -0.51,-0.79 0.51,0.79, body extent -1.6,-0.75 1.6,0.75, height 0.8
Res-0402 [mil]
  rect 18x25 smd mask+2.17: 1(-18.5,0) 2(18.5,0)
  silkscreen extent -32,-17 32,16, body extent -23,-11 23,11, height 16
Res-0603 [mil]
  rect 30x35 smd: 1(-30,0) 2(30,0)
  silkscreen extent -48,-21 48,21, body extent -31,-17 31,17, height 18
Res-1206 [mil]
  rect 60x70 smd: 1(-50,0) 2(50,0)
  silkscreen extent -84,-39 84,39, body extent -63,-31 63,31, height 24
SMA [mm]
  rect 2.5x1.7 smd: 1(-2,0) 2(2,0)
  silkscreen extent -4.45,-1.42 2.06,1.42, body extent -2.6,-1.3 2.6,1.3, height 2.4
SMC [mm]
  rect 4.1x4.3 smd: 1(-3.95,0) 2(3.95,0)
  silkscreen extent -7.24,-3.05 3.58,3.05, body extent -3.9,-2.95 3.9,2.95, height 2.41
SOD-523 [mm] "SOD-523 Schottky Barrier Diodes (SBD) ROHS"
  rect 0.6x0.7 smd: 1(-0.6,0) 2(0.6,0)
  silkscreen extent -0.61,-0.53 1.42,0.53, body extent -0.8,-0.4 0.8,0.4, height 0.7
"SOIC-8 (208 mil)" [mm]
  rect 1.61x0.58 smd: 1(-3.605,1.905) 2(-3.605,0.635) 3(-3.605,-0.635) 4(-3.605,-1.905) 5(3.605,-1.905) 6(3.605,-0.635) 7(3.605,0.635) 8(3.605,1.905)
  silkscreen extent -4.7,-2.69 2.69,2.69, body extent -3.95,-2.64 3.95,2.64, height 2.16
Sot-23 [mm] "TRANS NPN 40V 0.6A SOT23"
  rect 0.82x0.92 smd: 1(-0.95,-1) 2(0.95,-1) 3(0,1)
  silkscreen extent -1.68,-1.3 1.55,0.81, body extent -1.5,-1.25 1.5,1.25, height 1.05
SOT-23 [mm] "TRANS NPN 40V 0.6A SOT23"
  rect 0.82x0.92 smd: 1(-0.95,-1) 2(0.95,-1) 3(0,1)
  silkscreen extent -1.68,-1.3 1.55,0.81, body extent -1.5,-1.25 1.5,1.25, height 1.05
SOT-723 [mm]
  rect 0.5x0.45 smd: 1(-0.4,-0.575) 2(0.4,-0.575) 3(0,0.575)
  silkscreen extent -0.94,-0.66 0.64,0.64, body extent -0.6,-0.6 0.6,0.6, height 0.5
"SOT- 223" [mm]
  rect 1.5x2 smd: 1(-2.3,-3.05) 2(0,-3.05) 3(2.3,-3.05)
  rect 3.8x2 smd: 4(0,3.05)
  silkscreen extent -3.35,-3.2 3.3,1.8, body extent -3.25,-3.5 3.25,3.5, height 1.61
SWPA5020S3R9NT [mm]
  rect 1.4x4.2 smd: 1(-1.85,0) 2(1.85,0)
  silkscreen extent -2.4,-2.55 2.38,2.55, body extent -2.51,-2.5 2.51,2.5, height 2.12
Tant-1206 [mil]
  rect 60x70 smd: 1(-50,0) 2(50,0)
  silkscreen extent -84,-39 84,39, body extent -63,-31 63,31, height 71
"Test-point - 0.5mm" [mm]
  oct 1x1 smd: 1(0,0)
  silkscreen extent -0.68,-0.68 0.68,0.68
"Through Hole Pads 2" [mm]
  round 3.5 hole 1.8: 1(0,0) 2(4.5,0)
  silkscreen extent -2.03,-2.01 6.53,2.01
TSOT-23-6 [mm]
  rect 1x0.6 smd: 1(-1.2,0.95) 2(-1.2,0) 3(-1.2,-0.95) 4(1.2,-0.95) 5(1.2,0) 6(1.2,0.95)
  silkscreen extent -1.98,-1.5 0.86,1.5, body extent -1.41,-1.45 1.41,1.45, height 1
"VSOF 5" [mm]
  rect 0.35x0.25 smd: 1(-0.675,0.5) 2(-0.675,0) 3(-0.675,-0.5) 4(0.675,-0.5) 5(0.675,0.5)
  silkscreen extent -1.12,-0.86 0.51,0.86, body extent -0.8,-0.82 0.8,0.82, height 0.6
X322524MOB4SI- [mm]
  rect 1.4x1.2 smd: 1(-1.1,-0.85) 2(1.1,-0.85) 3(1.1,0.85) 4(-1.1,0.85)
  silkscreen extent -2.13,-1.3 1.65,1.3, body extent -1.6,-1.25 1.6,1.25, height 0.8
XAL6030-102MEC [mm]
  rect 1.43x5.5 smd: 1(-2.02,0) 2(2.02,0)
  silkscreen extent -3.23,-3.33 3.23,3.35, body extent -3.18,-3.28 3.18,3.29, height 6.1

## Part data
C1 C2 C11 C63: library part CC0402KRX5R7BB105, "CAP CER 1UF 16V X5R 0402", Case Code (Imperial)=0402, Case Code (Metric)=1005, Dielectric=X5R, LCSC Part Number=C325464, Manufacturer=Yageo, Max Operating Temperature=85°C, Min Operating Temperature=-55°C, Supplier Part Number 1=311-1691-6-ND, Tolerance=10%, Voltage Rating=16V, Capacitance=1uF, Case/Package=0402, ComponentLink1Description=http://www.yageo.com/documents/recent/UPY-GPHC_X5R_4V-to-50V_12.pdf?src-supplier=Avnet+Europe, ComponentLink1URL=http://www.yageo.com/documents/recent/UPY-GPHC_X5R_4V-to-50V_12.pdf?src-supplier=Avnet+Europe, Composition=Ceramic, Depth=0.5mm, Halogen Free="Halogen Free", Height=0.5mm, Item Type=Capacitor, Lead Free="Lead Free", Length=1mm, Manufacturer Part Number=CC0402KRX5R7BB105, Mount="Surface Mount", Packaging="Tape and Reel", Pricing 1="1=0.36, 10=0.252, 100=0.1512, 500=0.1134, 1000=0.09576, 2500=0.09072, 5000=0.08568 (USD)", Radiation Hardening=No, Stock 1=1405667, Supplier 1=Digi-Key, Termination=SMD/SMT, Thickness=0.022inch, Voltage Rating (DC)=16V, Weight=2.3E-05oz, Width=0.02inch
C3 C5 C7 C9 C10 C23 C26 C27 C30 C31 C32 C33 C34 C35 C36 C37 C38 C45 C46 C48: library part CC0402KRX5R8BB224, "CAP CER 0.22UF 25V X5R 0402", Capacitance=220nF, Case/Package=0402, Dielectric=X5R, LCSC Part Number=C326836, Manufacturer=Yageo, Max Operating Temperature=85°C, Min Operating Temperature=-55°C, Supplier Part Number 1=603-CC402KRX5R8BB224, Tolerance=10%, Voltage Rating=25V, Category="Ceramic Capacitors", ComponentLink1Description=http://www.yageo.com/documents/recent/UPY-GPHC_X5R_4V-to-50V_25.pdf?src-supplier=Digi-Key, ComponentLink1URL=http://www.yageo.com/documents/recent/UPY-GPHC_X5R_4V-to-50V_25.pdf?src-supplier=Digi-Key, ComponentLink2Description=https://www.yageo.com/upload/media/product/productsearch/datasheet/mlcc/UPY-GPHC_X5R_4V-to-50V_26.pdf?src-supplier=Digi-Key, ComponentLink2URL=https://www.yageo.com/upload/media/product/productsearch/datasheet/mlcc/UPY-GPHC_X5R_4V-to-50V_26.pdf?src-supplier=Digi-Key, ComponentLink3Description=http://www.yageo.com/documents/recent/UPY-GPHC_X5R_4V-to-50V_23.pdf?src-supplier=Digi-Key, ComponentLink3URL=http://www.yageo.com/documents/recent/UPY-GPHC_X5R_4V-to-50V_23.pdf?src-supplier=Digi-Key, Halogen Free="Halogen Free", Lead Free="Lead Free", Length=0.039inch, Manufacturer Part Number=CC0402KRX5R8BB224, Mount="Surface Mount", Packaging="Tape and Reel", Pricing 1="1=0.10000, 10=0.03300, 50=0.03300, 100=0.02700, 1000=0.01500, 10000=0.01300 (USD)", RoHS=Yes, RoHS Compliant=Yes, Stock 1=61266, Supplier 1=Mouser, Thickness=0.022inch, Voltage Rating (DC)=25V, Width=0.02inch
C4 C6 C8 C15 C18 C20 C22 C25 C29: library part CC0402KRX5R6BB475, "CAP CER 4.7UF 10V X5R 0402", Case Code (Imperial)=0402, Case Code (Metric)=1005, LCSC Part Number=C326586, Manufacturer=Yageo, Max Operating Temperature=85°C, Min Operating Temperature=-55°C, Supplier Part Number 1=3871698, Tolerance=10%, Voltage Rating=10V, Capacitance=4.7uF, Case/Package=0402, Category="Ceramic Capacitors", ComponentLink1Description=http://www.yageo.com/documents/recent/UPY-GPHC_X5R_4V-to-50V_25.pdf?src-supplier=Digi-Key, ComponentLink1URL=http://www.yageo.com/documents/recent/UPY-GPHC_X5R_4V-to-50V_25.pdf?src-supplier=Digi-Key, Manufacturer Part Number=CC0402KRX5R6BB475, Mount="Surface Mount", Packaging="Cut Tape", Pricing 1="10000=0.02310, 50000=0.02100 (GBP)", RoHS=Yes, RoHS Compliant=Yes, Stock 1=20000, Supplier 1=Farnell
C12 C13 C14 C16 C17 C19 C21 C47 C49 C52 C53 C56 C57 C58 C59 C67 C68 C71 C72 C75 C76 C79 C80 C84 C90 C91 C92: library part C1005X7R1H104KT000F, "CAP CER 0.1UF 50V X7R 0402", Dielectric=X7R, LCSC Part Number=C361198, Manufacturer=TDK, Tolerance=10%, Voltage=25V, Category="Ceramic Capacitors", ComponentLink1Description=LCSC, ComponentLink1URL=https://www.lcsc.com/product-detail/Multilayer-Ceramic-Capacitors-MLCC-SMD-SMT_TDK-C1005X7R1H104KT000F_C361198.html, Item Type=Capacitor, Manufacturer Part Number=C1005X7R1H104KT000F, RoHS=No, Supplier 1=Avnet, Supplier Part Number 1=C1005X7R1H104KT000F
C24 C28 C61 C62 C82: library part CC0603MRX5R6BB226, "CAP CER 22UF 10V X5R 0603", Case Code (Imperial)=0603, Case Code (Metric)=1608, Dielectric=X5R, LCSC Part Number=C109447, Manufacturer=Yageo, Max Operating Temperature=85°C, Min Operating Temperature=-55°C, Package Quantity=4000, Supplier Part Number 1=311-1819-1-ND, Tolerance=20%, Voltage Rating=10V, Capacitance=22uF, Case/Package=0603, Category="Ceramic Capacitors", ComponentLink1Description=http://www.mouser.com/ds/2/447/Yageo_UPY-GP_NP0_16V-to-50V_9-358835.pdf?src-supplier=Mouser, ComponentLink1URL=http://www.mouser.com/ds/2/447/Yageo_UPY-GP_NP0_16V-to-50V_9-358835.pdf?src-supplier=Mouser, ComponentLink2Description=http://www.yageo.com/documents/recent/UPY-GPHC_X5R_4V-to-50V_25.pdf?src-supplier=Digi-Key, ComponentLink2URL=http://www.yageo.com/documents/recent/UPY-GPHC_X5R_4V-to-50V_25.pdf?src-supplier=Digi-Key, Halogen Free="Halogen Free", Height=0.8mm, Item Type=Capacitor, Lead Free="Lead Free", Length=0.063inch, Manufacturer Part Number=CC0603MRX5R6BB226, Mount="Surface Mount", Packaging="Tape and Reel", Pricing 1="1=0.68000, 10=0.48000, 50=0.36300, 100=0.31610, 500=0.23416, 1000=0.19903 (USD)", RoHS=Yes, RoHS Compliant=Yes, Stock 1=19628, Supplier 1=Digi-Key, Termination=SMD/SMT, Thickness=0.035inch, Voltage Rating (DC)=10V, Weight=7.1E-05oz, Width=0.8mm
C39 C40 C42 C43: library part GJM1555C1H120GB01D, "CAP CER 12PF 50V C0G/NP0 0402", Case Code (Imperial)=0402, Case Code (Metric)=1005, Dielectric=C0G, LCSC Part Number=C161305, Manufacturer=Murata, Max Operating Temperature=125°C, Min Operating Temperature=-55°C, Package Quantity=10000, Supplier Part Number 1=490-8078-1-ND, Tolerance=2%, Voltage Rating=50V, Capacitance=12pF, Case/Package=0402, Category="Ceramic Capacitors", ComponentLink1Description=https://datasheet.ciiva.com/11608/product-11608208.pdf?src-supplier=Avnet, ComponentLink1URL=https://datasheet.ciiva.com/11608/product-11608208.pdf?src-supplier=Avnet, ComponentLink2Description=https://datasheet.ciiva.com/29542/partnumbering-e-01-29542716.pdf?src-supplier=Digi-Key, ComponentLink2URL=https://datasheet.ciiva.com/29542/partnumbering-e-01-29542716.pdf?src-supplier=Digi-Key, ComponentLink3Description=https://datasheet.ciiva.com/29542/partnumbering-e-01-29542715.pdf?src-supplier=Digi-Key, ComponentLink3URL=https://datasheet.ciiva.com/29542/partnumbering-e-01-29542715.pdf?src-supplier=Digi-Key, ComponentLink4Description=https://datasheet.ciiva.com/29542/partnumbering-e-01-29542717.pdf?src-supplier=Digi-Key, ComponentLink4URL=https://datasheet.ciiva.com/29542/partnumbering-e-01-29542717.pdf?src-supplier=Digi-Key, Construction=Flat, Depth=0.5mm, Height=0.5mm, Lead Free="Lead Free", Length=1mm, Manufacturer Part Number=GJM1555C1H120GB01D, Mount="Surface Mount", Packaging="Tape and Reel", Pricing 1="1=0.18000, 10=0.12600, 50=0.07560, 100=0.06390, 500=0.04370, 1000=0.03865, 2500=0.03698, 5000=0.03361 (USD)", Radiation Hardening=No, RoHS=Yes, RoHS Compliant=Yes, Series=GJM, Stock 1=266975, Supplier 1=Digi-Key, Termination=SMD/SMT, Thickness=0.022inch, Voltage Rating (DC)=50V, Width=0.5mm
C41: library part C3216X5R1A336MTJ00N, "10V 33uF X5R ±20% 1206 ROHS", LCSC Part Number=C342606, Manufacturer=TDK, Package=1206, ComponentLink1Description=https://datasheet.ciiva.com/24216/c3216x5r1a336m160ab-264972-24216176.pdf?src-supplier=Mouser, ComponentLink1URL=https://datasheet.ciiva.com/24216/c3216x5r1a336m160ab-264972-24216176.pdf?src-supplier=Mouser, ComponentLink2Description=https://datasheet.ciiva.com/16482/mlccspec-commercial-general-midvoltage-en-16482550.pdf?src-supplier=Future+Electronics, ComponentLink2URL=https://datasheet.ciiva.com/16482/mlccspec-commercial-general-midvoltage-en-16482550.pdf?src-supplier=Future+Electronics, ComponentLink3Description=https://datasheet.ciiva.com/6253/tdkmlcccaprange-6253132.pdf?src-supplier=Digi-Key, ComponentLink3URL=https://datasheet.ciiva.com/6253/tdkmlcccaprange-6253132.pdf?src-supplier=Digi-Key, ComponentLink4Description=https://datasheet.ciiva.com/6253/tdkmlcccaprange-6253134.pdf?src-supplier=Digi-Key, ComponentLink4URL=https://datasheet.ciiva.com/6253/tdkmlcccaprange-6253134.pdf?src-supplier=Digi-Key, Item Type=Capacitor, Manufacturer Part Number=C3216X5R1A336MTJ00N
C44 C60 C83: library part CL10A106MA8NRNC, "CAP CER 10UF 25V X5R 0603", Case Code (Imperial)=0603, Case Code (Metric)=1608, Dielectric=X5R, LCSC Part Number=C96446, Manufacturer=Samsung, Max Operating Temperature=85°C, Min Operating Temperature=-55°C, Package Quantity=1, Tolerance=20%, Voltage Rating=25V, Capacitance=10uF, Case/Package=0603, Category="Ceramic Capacitors", ComponentLink1Description=https://datasheet.ciiva.com/25766/cl10a106ma8nrnc-25766562.pdf?src-supplier=Digi-Key, ComponentLink1URL=https://datasheet.ciiva.com/25766/cl10a106ma8nrnc-25766562.pdf?src-supplier=Digi-Key, Construction=Flat, Contact Plating=Tin, Lead Free="Lead Free", Length=0.063inch, Manufacturer Part Number=CL10A106MA8NRNC, Mount="Surface Mount", Packaging="Tape and Reel", Pricing 1="4000=0.03753, 8000=0.03700, 16000=0.03595, 24000=0.03515, 32000=0.03383, 40000=0.03304, 400000=0.03225 (USD)", RoHS=Yes, RoHS Compliant=Yes, Series=CL, Supplier 1=Avnet, Supplier Part Number 1=CL10A106MA8NRNC, Termination=Wraparound, Thickness=0.035inch, Width=0.031inch
C50 C51 C65 C66 C73 C74: library part TMCMA1A476MTRF, "CAP TANT 47UF 20% 10V 1206", Case Code (Imperial)=1206, Case Code (Metric)=3216, ESR (Equivalent Series Resistance)=2.6R, LCSC Part Number=C4984790, Leakage Current=9.4uA, Manufacturer="Vishay Sprague", Max Operating Temperature=125°C, Min Operating Temperature=-55°C, Package Quantity=2000, Ripple Current=173mA, Tolerance=20%, Voltage Rating=10V, Case/Package=1206, ComponentLink1Description=http://www.farnell.com/datasheets/1948250.pdf?src-supplier=Farnell, ComponentLink1URL=http://www.farnell.com/datasheets/1948250.pdf?src-supplier=Farnell, ComponentLink2Description=http://www.mouser.com/ds/2/427/tmcm-515668.pdf?src-supplier=Mouser, ComponentLink2URL=http://www.mouser.com/ds/2/427/tmcm-515668.pdf?src-supplier=Mouser, ComponentLink3Description=http://www.farnell.com/datasheets/2245108.pdf?src-supplier=Farnell, ComponentLink3URL=http://www.farnell.com/datasheets/2245108.pdf?src-supplier=Farnell, ComponentLink4Description=http://www.farnell.com/datasheets/1948250.pdf?src-supplier=Element14, ComponentLink4URL=http://www.farnell.com/datasheets/1948250.pdf?src-supplier=Element14, ComponentLink5Description=http://www.vishay.com/docs/40178/tmcm.pdf?src-supplier=Avnet, ComponentLink5URL=http://www.vishay.com/docs/40178/tmcm.pdf?src-supplier=Avnet, Dissipation Factor=20%, Height=1.8mm, Item Type=Capacitors, Length=3.2mm, Manufacturer Part Number=TMCMA1A476MTRF, Mounting Technology="Surface Mount", Packaging="Tape and Reel", Pricing="1=0.44, 10=0.271, 50=0.271, 100=0.175, 1000=0.146, 10000=0.119 (USD)", Reach SVHC Compliant=Unknown, RoHS=Yes, RoHS Compliant=Yes, Series=TMCM, Stock=7380, Supplier=Mouser, Termination=SMD/SMT, Voltage Rating (DC)=10V, Weight=0.000571oz, Width=1.6mm
C54 C55 C69 C70 C77 C78: library part CC0402JRX7R7BB223, "CAP CER 0.022UF 16V X7R 0402", Case Code (Imperial)=0402, Case Code (Metric)=1005, Dielectric=X7R, LCSC Part Number=C541459, Manufacturer=Yageo, Max Operating Temperature=125°C, Min Operating Temperature=-55°C, Supplier Part Number=311-3758-1-ND, Tolerance=5%, Voltage Rating=16V, Case/Package=0402, Category="Ceramic Capacitors", ComponentLink1Description=https://datasheet.ciiva.com/13264/upy-gphc-x7r-6-3v-to-50v-8-12304-13264039.pdf?src-supplier=Mouser, ComponentLink1URL=https://datasheet.ciiva.com/13264/upy-gphc-x7r-6-3v-to-50v-8-12304-13264039.pdf?src-supplier=Mouser, Halogen Free=5694HalogenFree, Item Type=Capacitor, Lead Free=5697LeadFree, Length=0.039inch, Manufacturer Part Number=CC0402JRX7R7BB223, Mounting Technology="Surface Mount", Packaging="Tape and Reel", Pricing="1=0.1, 10=0.033, 50=0.0192, 100=0.0149, 500=0.0112, 1000=0.0088, 2500=0.008, 5000=0.00736 (USD)", RoHS=Yes, RoHS Compliant=Yes, Series=CC, Stock=4203, Supplier=Digikey, Termination=SMD/SMT, Thickness=0.022inch, Voltage Rating (DC)=16V, Weight=2.3E-05oz, Width=0.5mm
C64: library part CC0603JRNPO8BN102, "CAP CER 1000PF 25V C0G/NPO 0603", Case Code (Imperial)=0603, Case Code (Metric)=1608, Dielectric=C0G, LCSC Part Number=C309470, Manufacturer=Yageo, Max Operating Temperature=125°C, Min Operating Temperature=-55°C, Package Quantity=1, Supplier Part Number 1=311-1342-1-ND, Tolerance=5%, Voltage Rating=25V, Capacitance=1nF, Case/Package=0603, ComponentLink1Description=http://www.farnell.com/datasheets/1132289.pdf?src-supplier=Element14, ComponentLink1URL=http://www.farnell.com/datasheets/1132289.pdf?src-supplier=Element14, ComponentLink2Description=http://www.farnell.com/datasheets/2213336.pdf?src-supplier=Element14, ComponentLink2URL=http://www.farnell.com/datasheets/2213336.pdf?src-supplier=Element14, ComponentLink3Description=http://www.yageo.com/documents/recent/UPY-GP_NP0_16V-to-50V_16.pdf?src-supplier=Digi-Key, ComponentLink3URL=http://www.yageo.com/documents/recent/UPY-GP_NP0_16V-to-50V_16.pdf?src-supplier=Digi-Key, ComponentLink4Description=http://www.yageo.com/exep/pages/download/literatures/ProductSelectionGuide%202014_Final_2.pdf?src-supplier=Digi-Key, ComponentLink4URL=http://www.yageo.com/exep/pages/download/literatures/ProductSelectionGuide%202014_Final_2.pdf?src-supplier=Digi-Key, ComponentLink5Description=http://www.yageo.com/documents/recent/UPY-GP_NP0_16V-to-50V_8.pdf?src-supplier=Avnet, ComponentLink5URL=http://www.yageo.com/documents/recent/UPY-GP_NP0_16V-to-50V_8.pdf?src-supplier=Avnet, ComponentLink6Description=https://www.verical.com/server-webapp/html/getDatasheet?partID=403523&src-supplier=Verical, ComponentLink6URL=https://www.verical.com/server-webapp/html/getDatasheet?partID=403523&src-supplier=Verical, ComponentLink7Description=http://www.yageo.com/documents/recent/UPY-GP_NP0_16V-to-50V_8.pdf?src-supplier=Avnet+Europe, ComponentLink7URL=http://www.yageo.com/documents/recent/UPY-GP_NP0_16V-to-50V_8.pdf?src-supplier=Avnet+Europe, Construction=Flat, Depth=0.8mm, Height=0.8mm, Item Type=Capacitor, Lead Free="Lead Free", Length=1.6mm, Manufacturer Part Number=CC0603JRNPO8BN102, Mount="Surface Mount", Packaging="Tape and Reel", Pricing 1="1=0.1, 10=0.072, 50=0.0394, 100=0.0322, 500=0.02298, 1000=0.01806 (USD)", Radiation Hardening=No, REACH SVHC=Unknown, RoHS Compliant=Yes, Series=CC, Stock 1=290818, Supplier 1=Digi-Key, Termination=SMD/SMT, Thickness=0.035inch, Voltage Rating (DC)=25V, Width=0.031inch
C81: library part CC0402KRX5R7BB474, "CAP CER 0.47UF 16V X5R 0402", Case/Package=0402, LCSC Part Number=C527010, Manufacturer=Yageo, Max Operating Temperature=85°C, Min Operating Temperature=-55°C, Supplier Part Number 1=1070400, Tolerance=10%, Voltage Rating=16V, Capacitance=470nF, Category="Ceramic Capacitors", ComponentLink1Description=http://www.yageo.com/documents/recent/UPY-GPHC_X5R_4V-to-50V_25.pdf?src-supplier=Digi-Key, ComponentLink1URL=http://www.yageo.com/documents/recent/UPY-GPHC_X5R_4V-to-50V_25.pdf?src-supplier=Digi-Key, ComponentLink2Description=http://www.yageo.com/exep/pages/download/literatures/ProductSelectionGuide%202014_Final_2.pdf?src-supplier=Digi-Key, ComponentLink2URL=http://www.yageo.com/exep/pages/download/literatures/ProductSelectionGuide%202014_Final_2.pdf?src-supplier=Digi-Key, Halogen Free="Halogen Free", Item Type=Capacitor, Lead Free="Lead Free", Length=0.039inch, Manufacturer Part Number=CC0402KRX5R7BB474, Mount="Surface Mount", Packaging="Tape and Reel", Pricing 1="10000=0.01840, 20000=0.01800, 40000=0.01760, 50000=0.01750, 150000=0.01670 (USD)", RoHS=Yes, RoHS Compliant=Yes, Stock 1=10000, Supplier 1="Future Electronics", Thickness=0.022inch, Voltage Rating (DC)=16V, Width=0.02inch
C85: library part CL10B102KC8NNNC, "CAP CER 1nF 100V X7R 0603", Case Code (Imperial)=0603, Case Code (Metric)=1608, Dielectric=X7R, LCSC Part Number=C153291, Manufacturer=Samsung, Max Operating Temperature=125°C, Min Operating Temperature=-55°C, Package Quantity=1, Tolerance=10%, Voltage=100V, Capacitance=1nF, Case/Package=0603, Category="Ceramic Capacitors", ComponentLink1Description=https://datasheet.ciiva.com/25799/cl10b102kc8nnnc-25799476.pdf?src-supplier=Digi-Key, ComponentLink1URL=https://datasheet.ciiva.com/25799/cl10b102kc8nnnc-25799476.pdf?src-supplier=Digi-Key, ComponentLink2Description=https://datasheet.ciiva.com/29198/458286-da-01-en-vs-kondensator-0603-29198496.pdf?src-supplier=Conrad, ComponentLink2URL=https://datasheet.ciiva.com/29198/458286-da-01-en-vs-kondensator-0603-29198496.pdf?src-supplier=Conrad, ComponentLink3Description=https://datasheet.ciiva.com/26838/getdatasheetpartid-640779-26838395.pdf?src-supplier=Verical, ComponentLink3URL=https://datasheet.ciiva.com/26838/getdatasheetpartid-640779-26838395.pdf?src-supplier=Verical, ComponentLink4Description=https://datasheet.ciiva.com/26310/mlcc-catalogdownload2013-eng-26310266.pdf?src-supplier=Distrelec, ComponentLink4URL=https://datasheet.ciiva.com/26310/mlcc-catalogdownload2013-eng-26310266.pdf?src-supplier=Distrelec, ComponentLink5Description=https://datasheet.ciiva.com/16199/cl05b104kq5nnnc-16199246.pdf?src-supplier=Future+Electronics, ComponentLink5URL=https://datasheet.ciiva.com/16199/cl05b104kq5nnnc-16199246.pdf?src-supplier=Future+Electronics, Construction=Flat, Contact Plating=Tin, Depth=0.8mm, Height=0.8mm, Lead Free="Lead Free", Length=1.6mm, Manufacturer Part Number=CL10B102KC8NNNC, Material=Ceramic, Mount="Surface Mount", Packaging="Tape and Reel", Pricing 1="4000=0.00988, 8000=0.00987, 16000=0.00986, 24000=0.00985, 32000=0.00984, 40000=0.00982, 400000=0.00981 (USD)", Radiation Hardening=No, RoHS=Yes, RoHS Compliant=Yes, Series=CL, Stock 1=184000, Supplier 1=Avnet, Supplier Part Number 1=CL10B102KC8NNNC, Thickness=0.035inch, Voltage Rating=100V, Voltage Rating (DC)=100V, Width=0.031inch
C86 C87: library part TMK325ABJ476MM-P, "CAP CER 47uF 25V 1210", Case/Package=Ceramic, Dielectric=X5R, LCSC Part Number=C90142, Manufacturer="Taiyo Yuden", Max Operating Temperature=85°C, Min Operating Temperature=-55°C, Supplier Part Number 1=1782936, Tolerance=20%, Capacitance=47uF, Category="Ceramic Capacitors", ComponentLink1Description=http://www.yuden.co.jp/productdata/catalog/en/mlcc_all_e.pdf?src-supplier=Avnet+Asia, ComponentLink1URL=http://www.yuden.co.jp/productdata/catalog/en/mlcc_all_e.pdf?src-supplier=Avnet+Asia, ComponentLink2Description=http://ds.yuden.co.jp/TYCOMPAS/ut/detail.do?productNo=TMK325ABJ476MM-P&fileName=TMK325ABJ476MM-P_SS&mode=specSheetDownload&src-supplier=Digi-Key, ComponentLink2URL=http://ds.yuden.co.jp/TYCOMPAS/ut/detail.do?productNo=TMK325ABJ476MM-P&fileName=TMK325ABJ476MM-P_SS&mode=specSheetDownload&src-supplier=Digi-Key, ComponentLink3Description="https://ds.yuden.co.jp/TYCOMPAS/ut/detail?pn=TMK325ABJ476MM-P &amp;u=M&src-supplier=Digi-Key", ComponentLink3URL="https://ds.yuden.co.jp/TYCOMPAS/ut/detail?pn=TMK325ABJ476MM-P &amp;u=M&src-supplier=Digi-Key", Contact Plating=Tin, Lead Free="Lead Free", Length=3.2mm, Manufacturer Part Number=TMK325ABJ476MM-P, Mount="Surface Mount", Packaging="Tape and Reel", Pricing 1="1000=0.37500 (GBP)", RoHS=Yes, RoHS Compliant=Yes, Stock 1=1000, Supplier 1=RSComponents, Termination=Wraparound
C88: library part 0402B302K500NT, "50V 3nF 0402 Multilayer Ceramic Capacitors MLCC - SMD/SMT ROHS", LCSC Part Number=C2857967, Manufacturer="FH (Guangdong Fenghua Advanced Tech)", Package=0402, ComponentLink1Description=LCSC, ComponentLink1URL=https://www.lcsc.com/product-detail/Multilayer-Ceramic-Capacitors-MLCC-SMD-SMT_FH-Guangdong-Fenghua-Advanced-Tech-0402B302K500NT_C2857967.html, Item Type=Capacitor, Manufacturer Part Number=0402B302K500NT
C89: library part CA45-D025K476T, "47uF 25V 0.9Ω@100kHz ±10% CASE-D-7343 Tantalum Capacitors ROHS", LCSC Part Number=C123267, Manufacturer="Hunan Xiangyee in S&T", Package=CASE-D-7343, ComponentLink1Description=LCSC, ComponentLink1URL=https://www.lcsc.com/product-detail/Tantalum-Capacitors_Hunan-Xiangyee-in-S-T-CA45-D025K476T_C123267.html, Item Type=Capacitor, Manufacturer Part Number=CA45-D025K476T
D1 D6 D7: "DIODE SCHOTTKY 30V 200MA SOD523", LCSC Part Number=C553812, Manufacturer=Nexperia, Item Type=Diode, Manufacturer Part Number=RB521S30YL, Pricing="1=0.23, 10=0.16, 100=0.0782, 500=0.06524, 1000=0.04533, 2000=0.03929 (USD)", RoHS=No, Stock=7640, Supplier=Digikey